# Altium PCB WGI_BOARD.PcbDoc (part 1 of 3)
Units mm, origin at the board's own origin, x right, y up, seen from the top; angles counter-clockwise.
Board outline 79.5 x 49.7 mm, 4 copper layers (Top Layer, Layer 1, Layer 2, Bottom Layer), stack 1.454 mm thick; 210 components, 179 nets, 665 pads, 228 vias.
Unrouted connection lines stored in the file: 133.
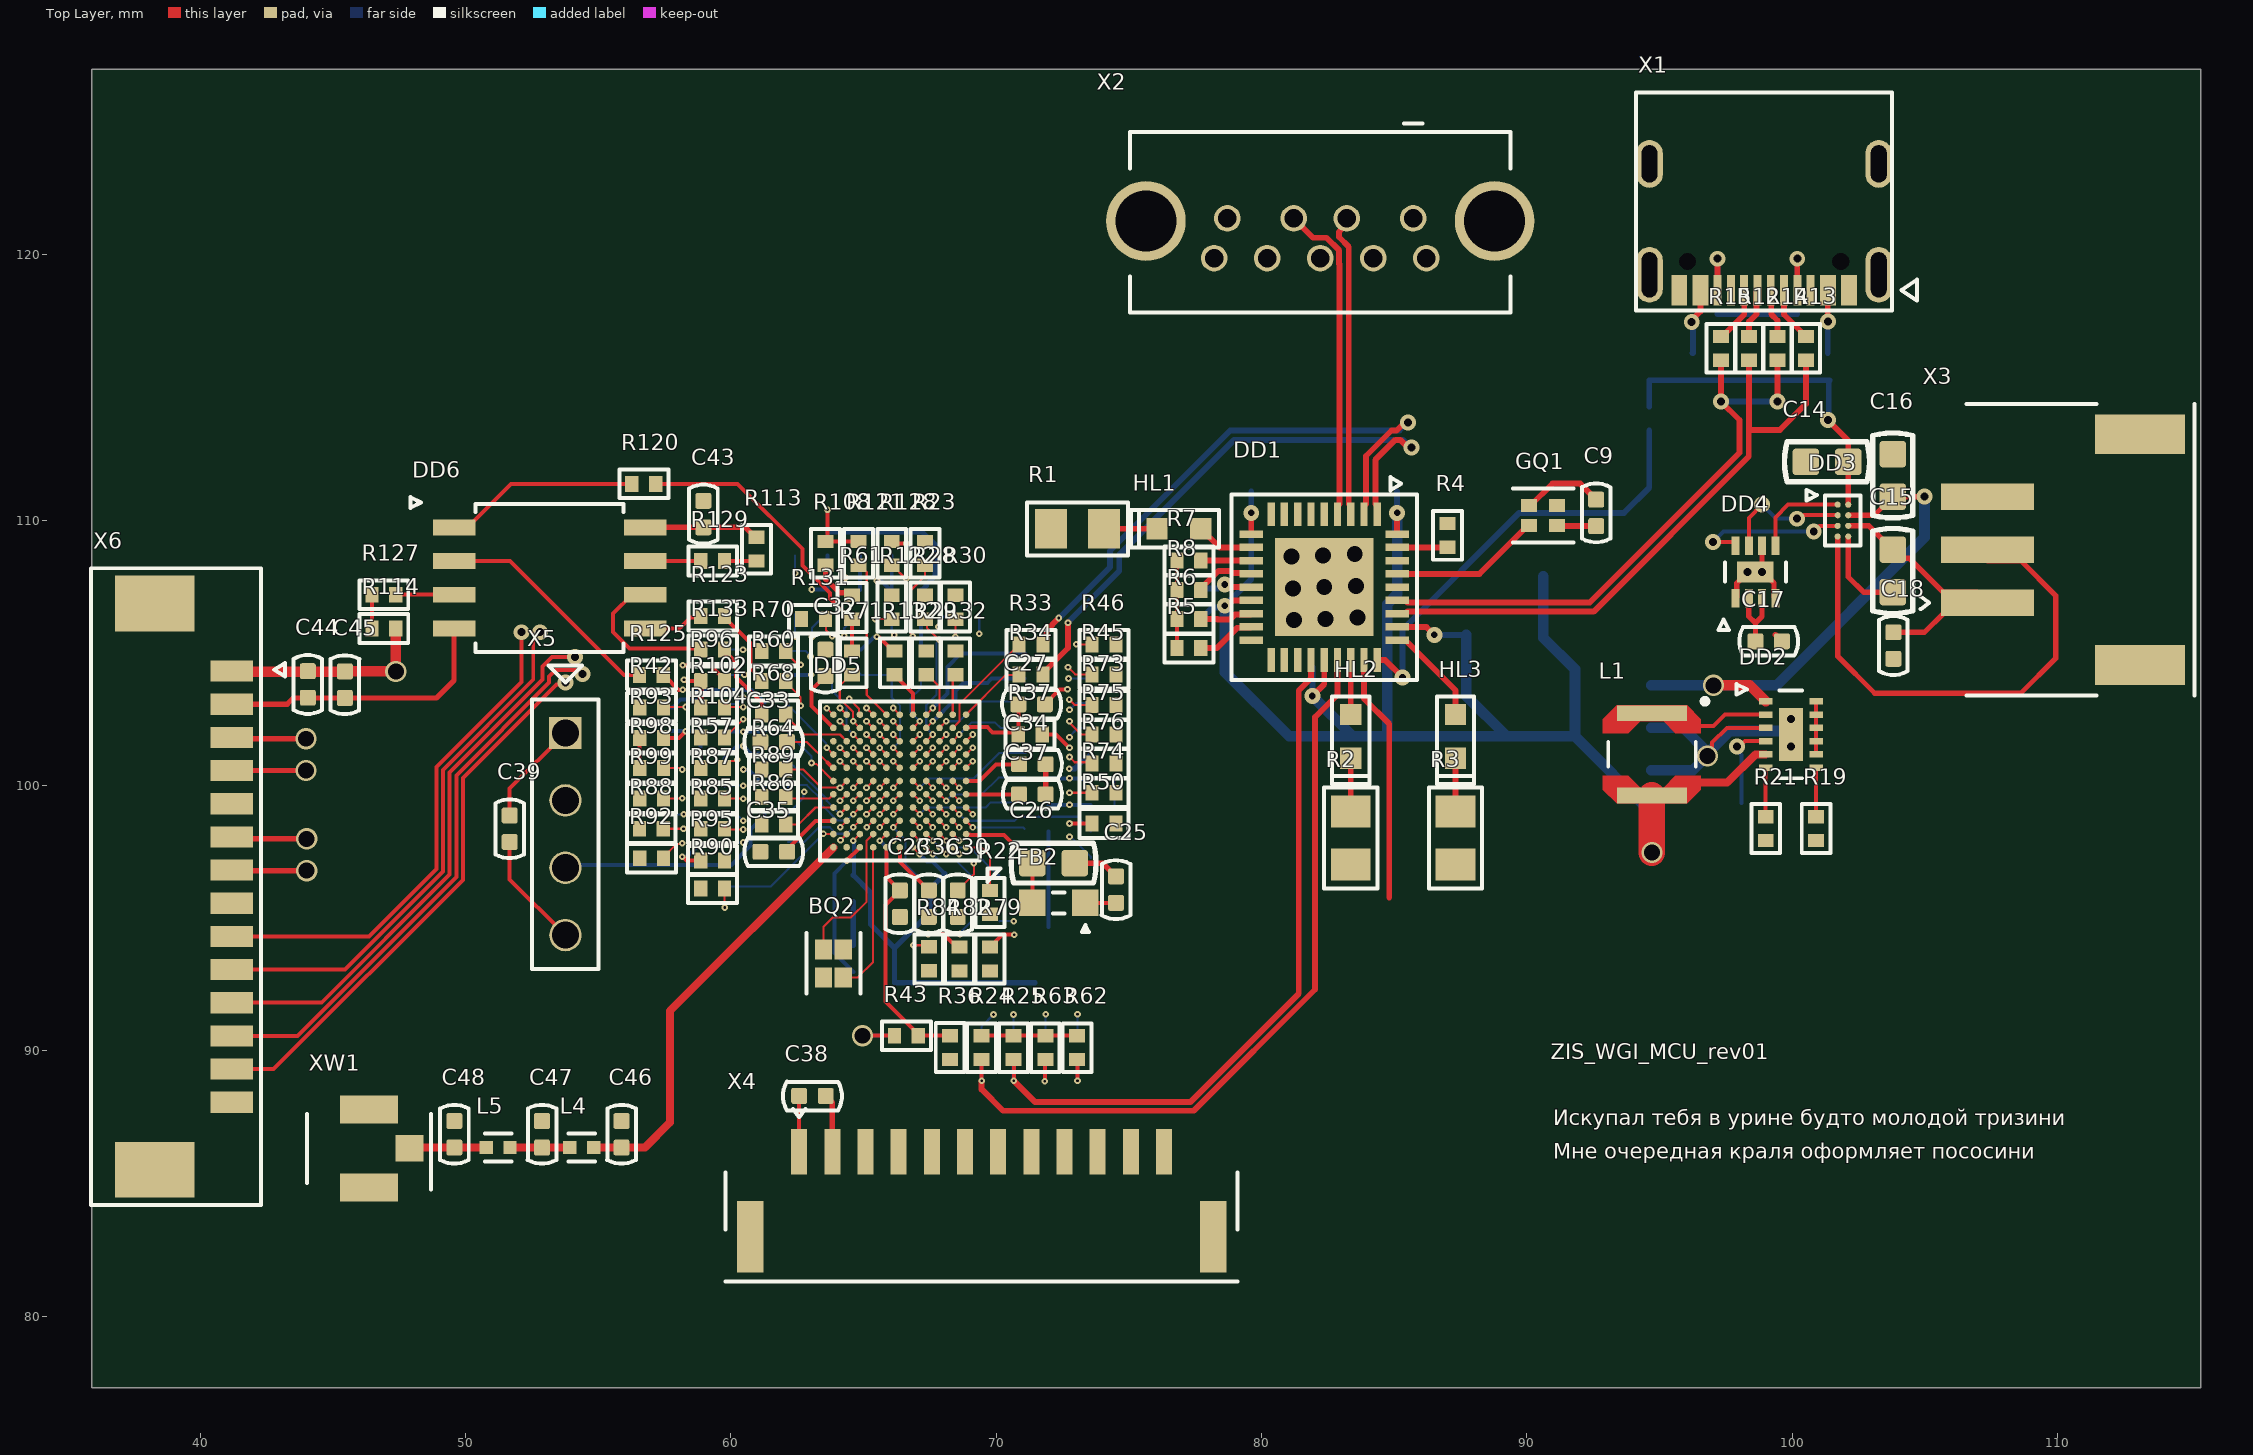
[diagram p0: Top Layer view]
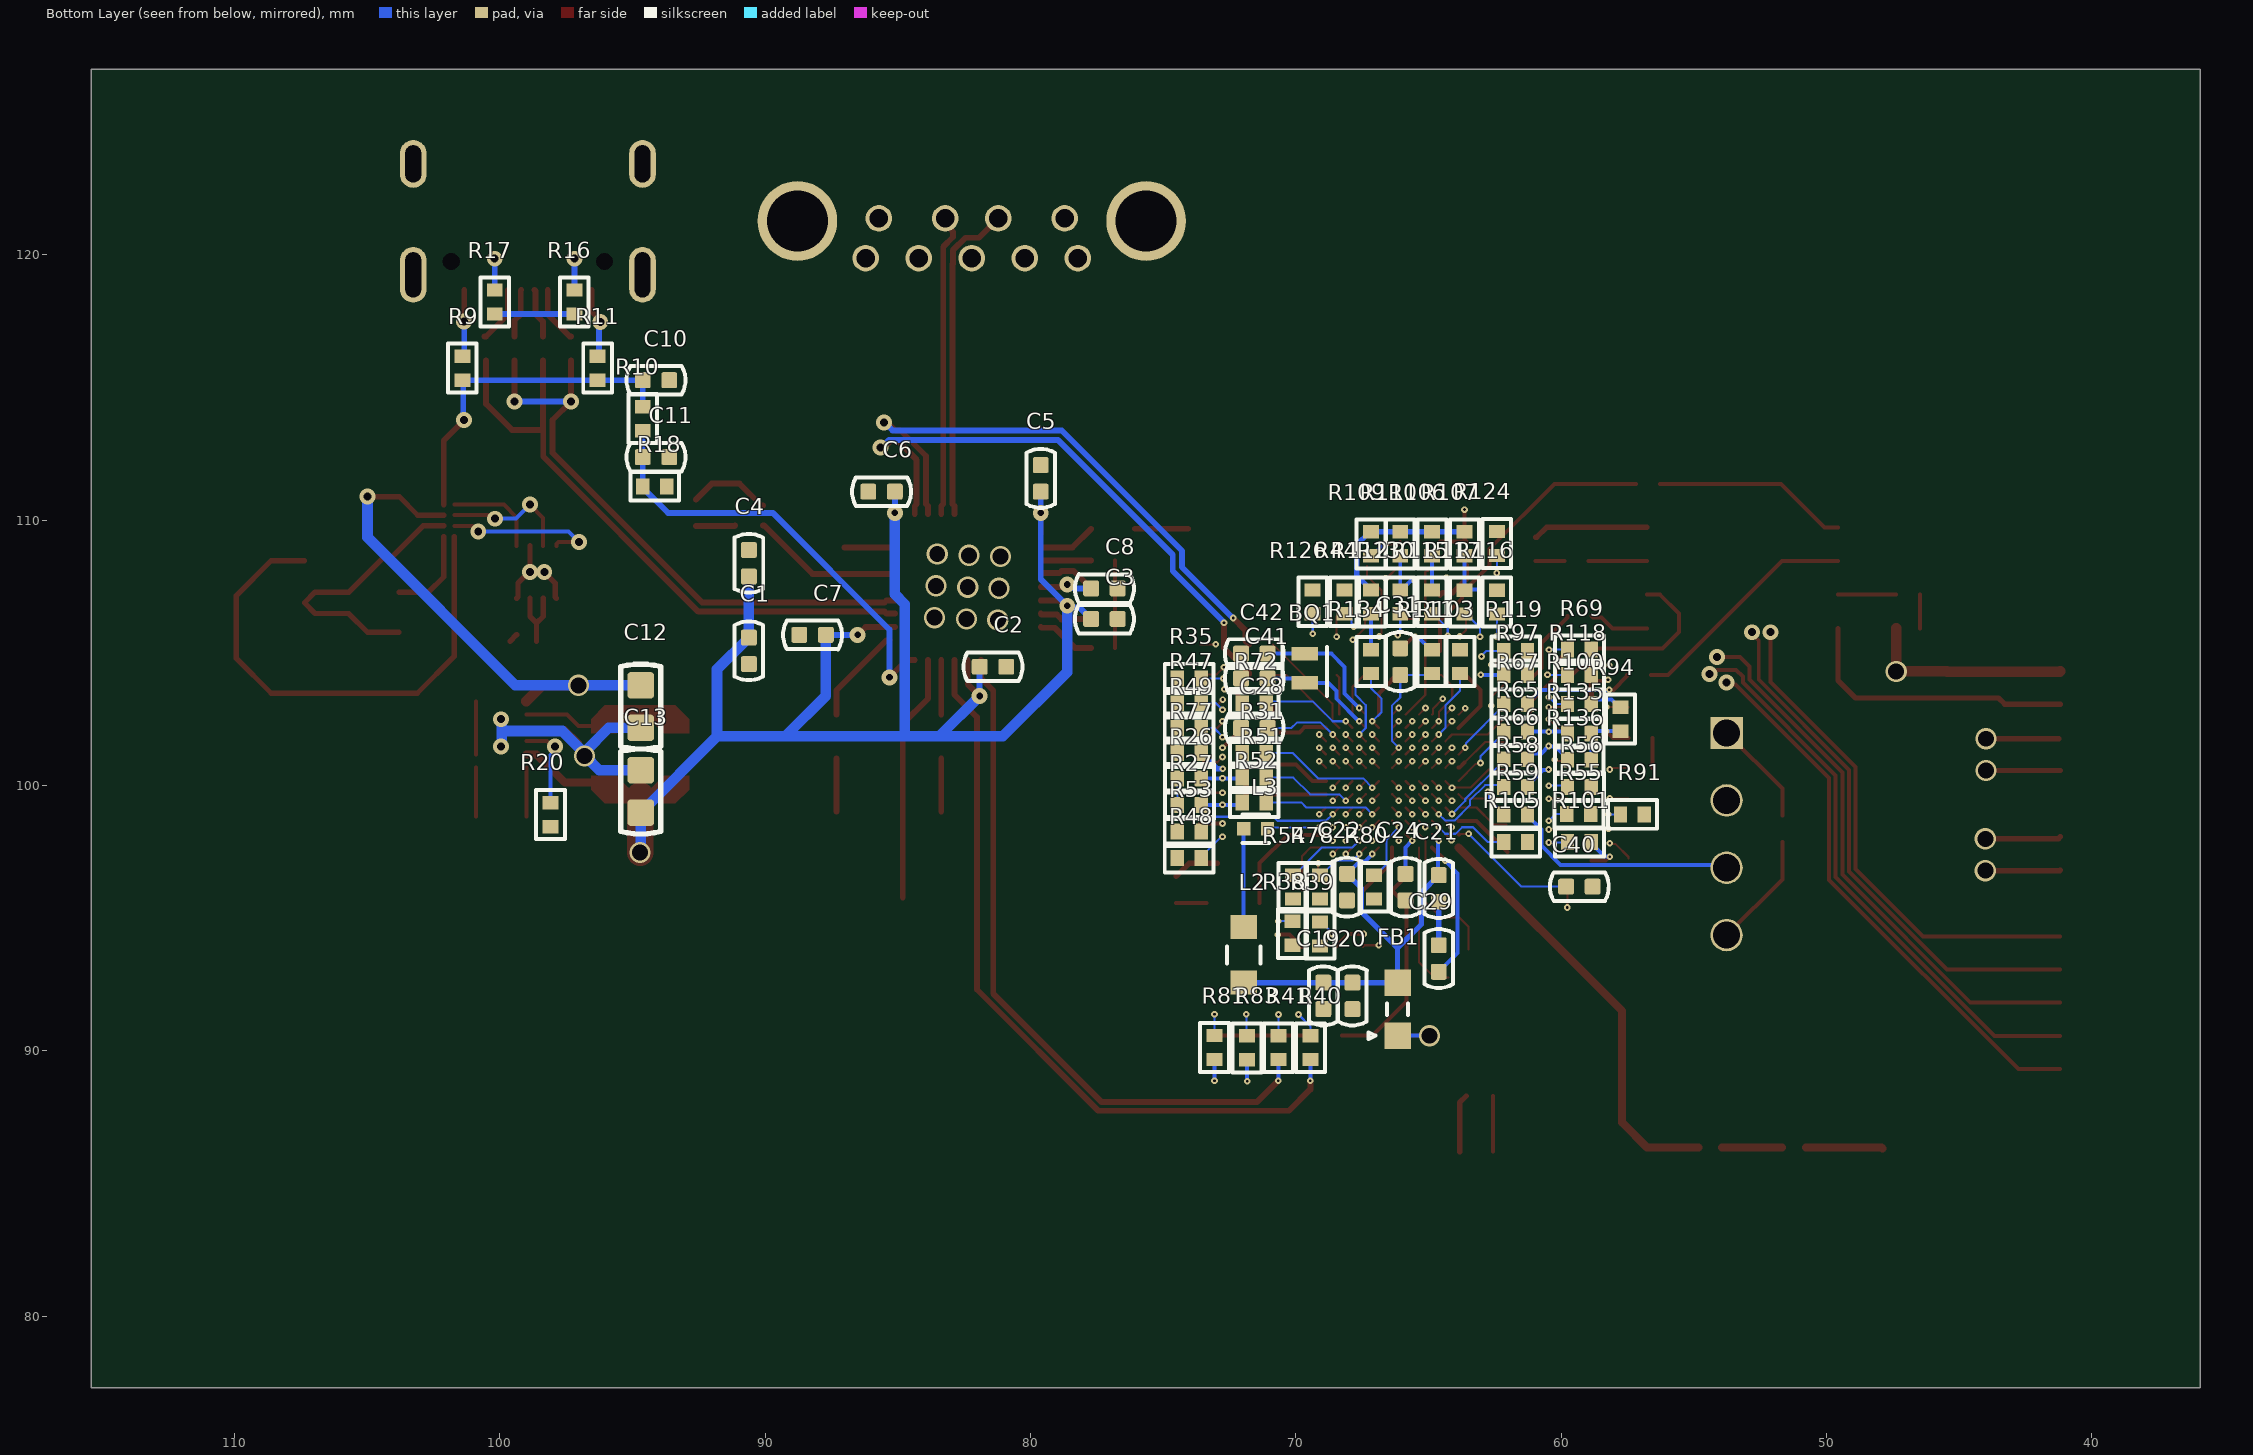
[diagram p1: Bottom Layer view, seen from below]
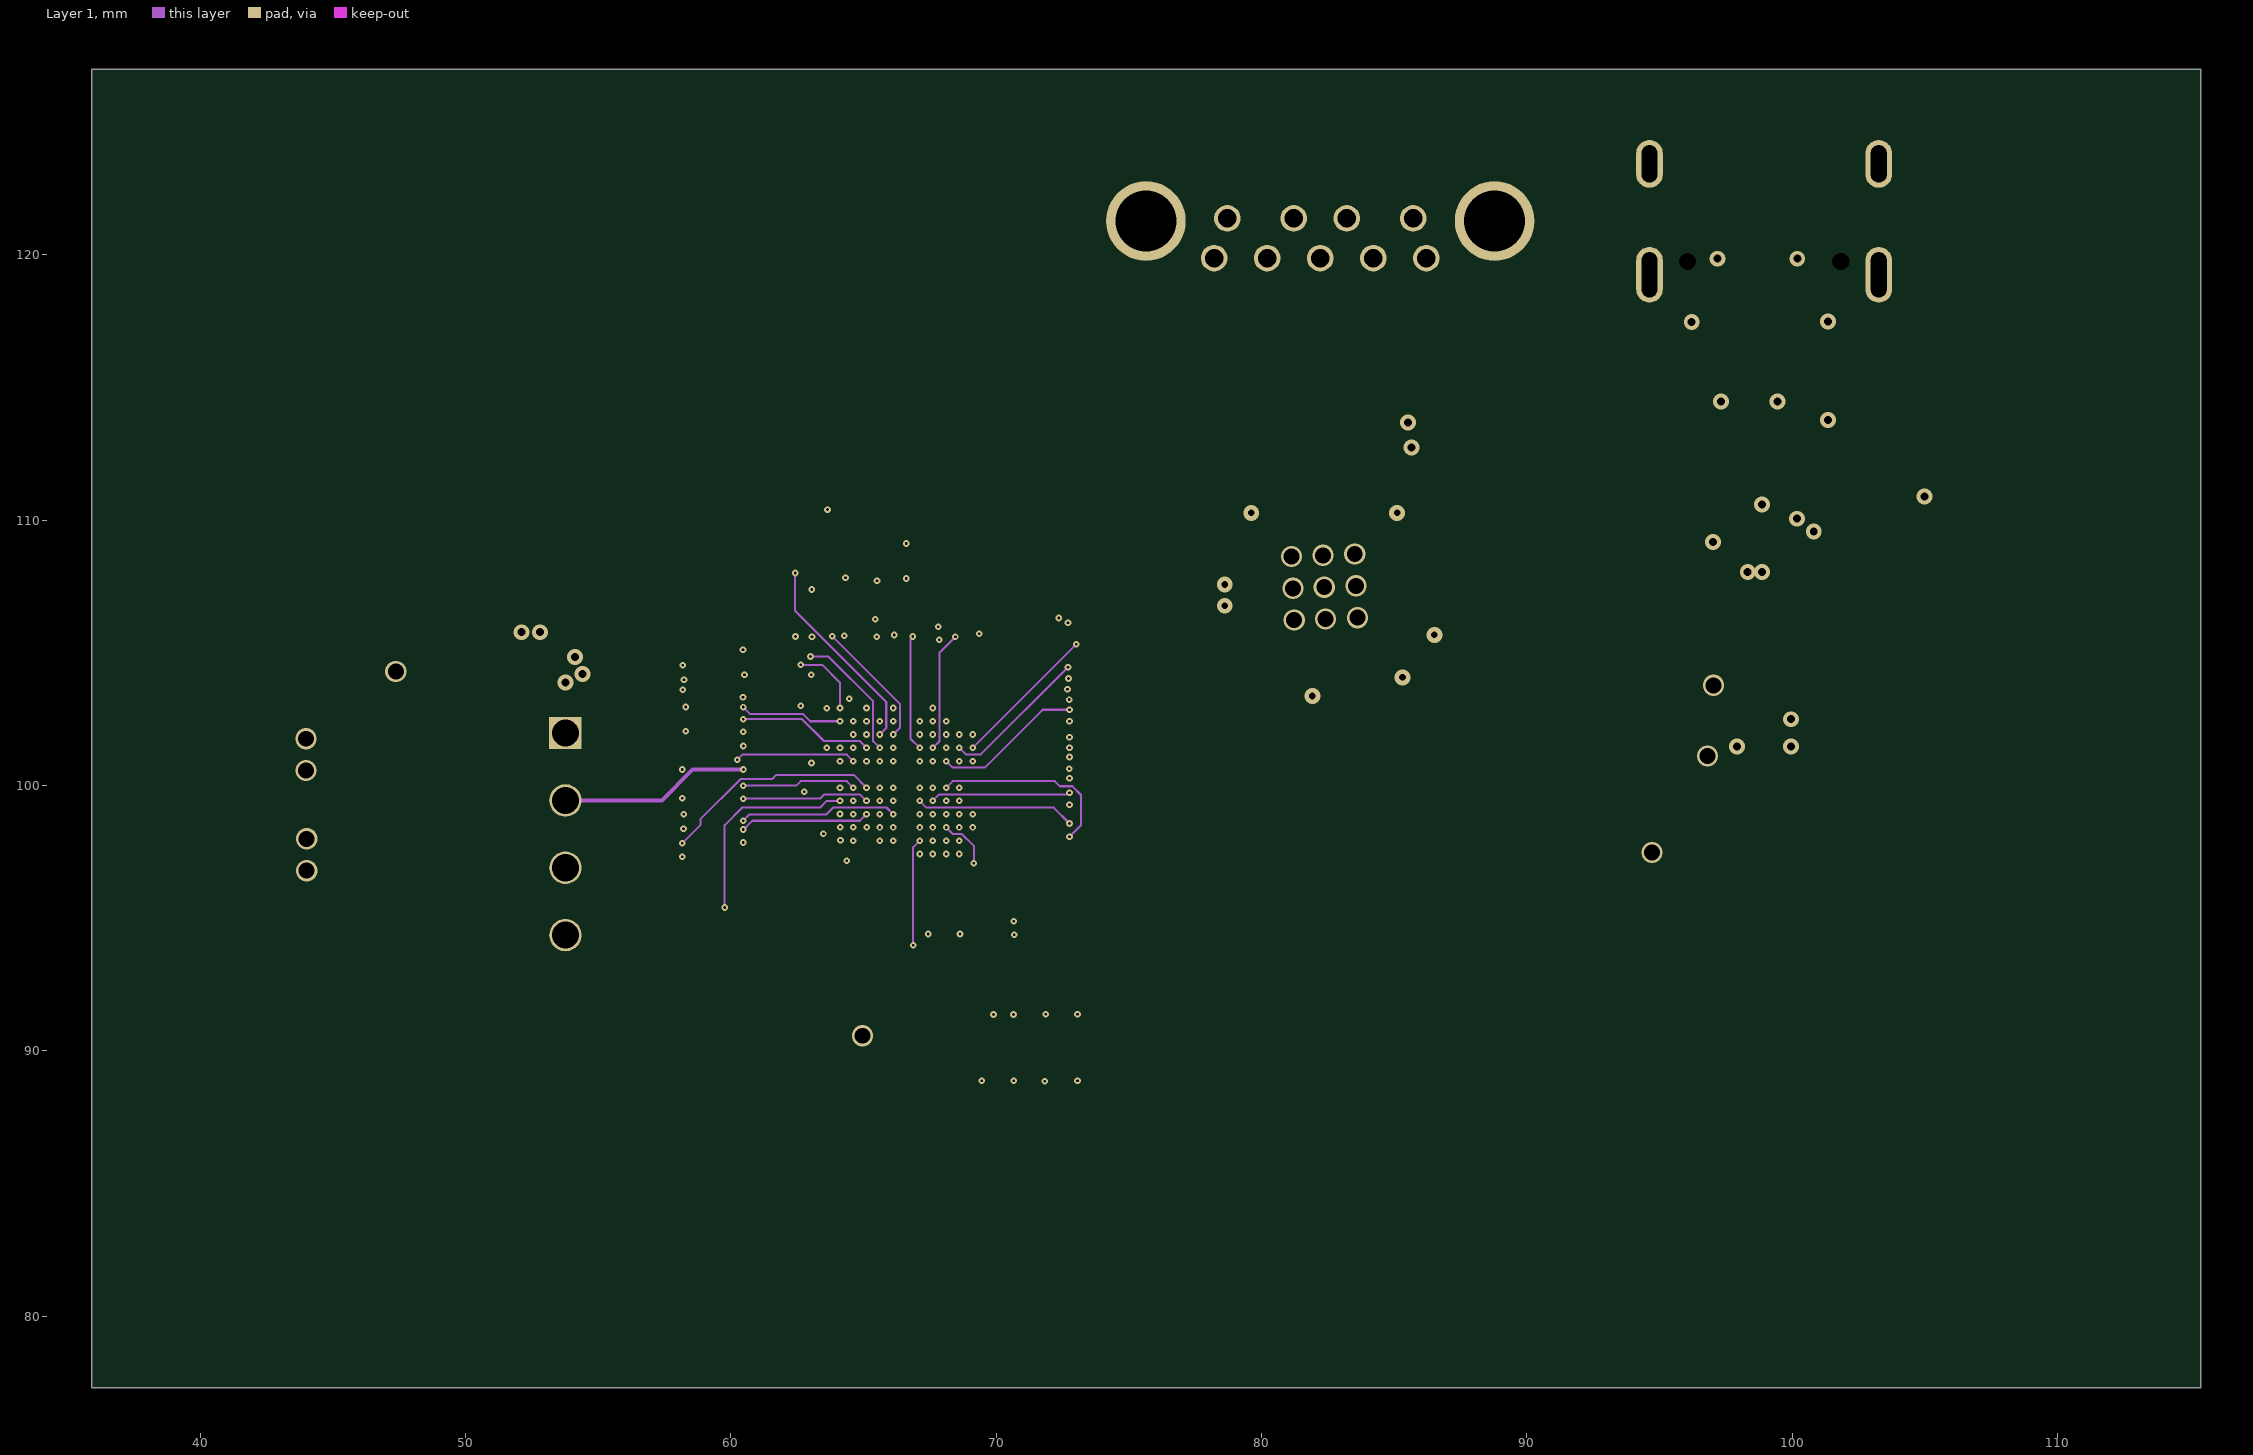
[diagram p2: Layer 1]
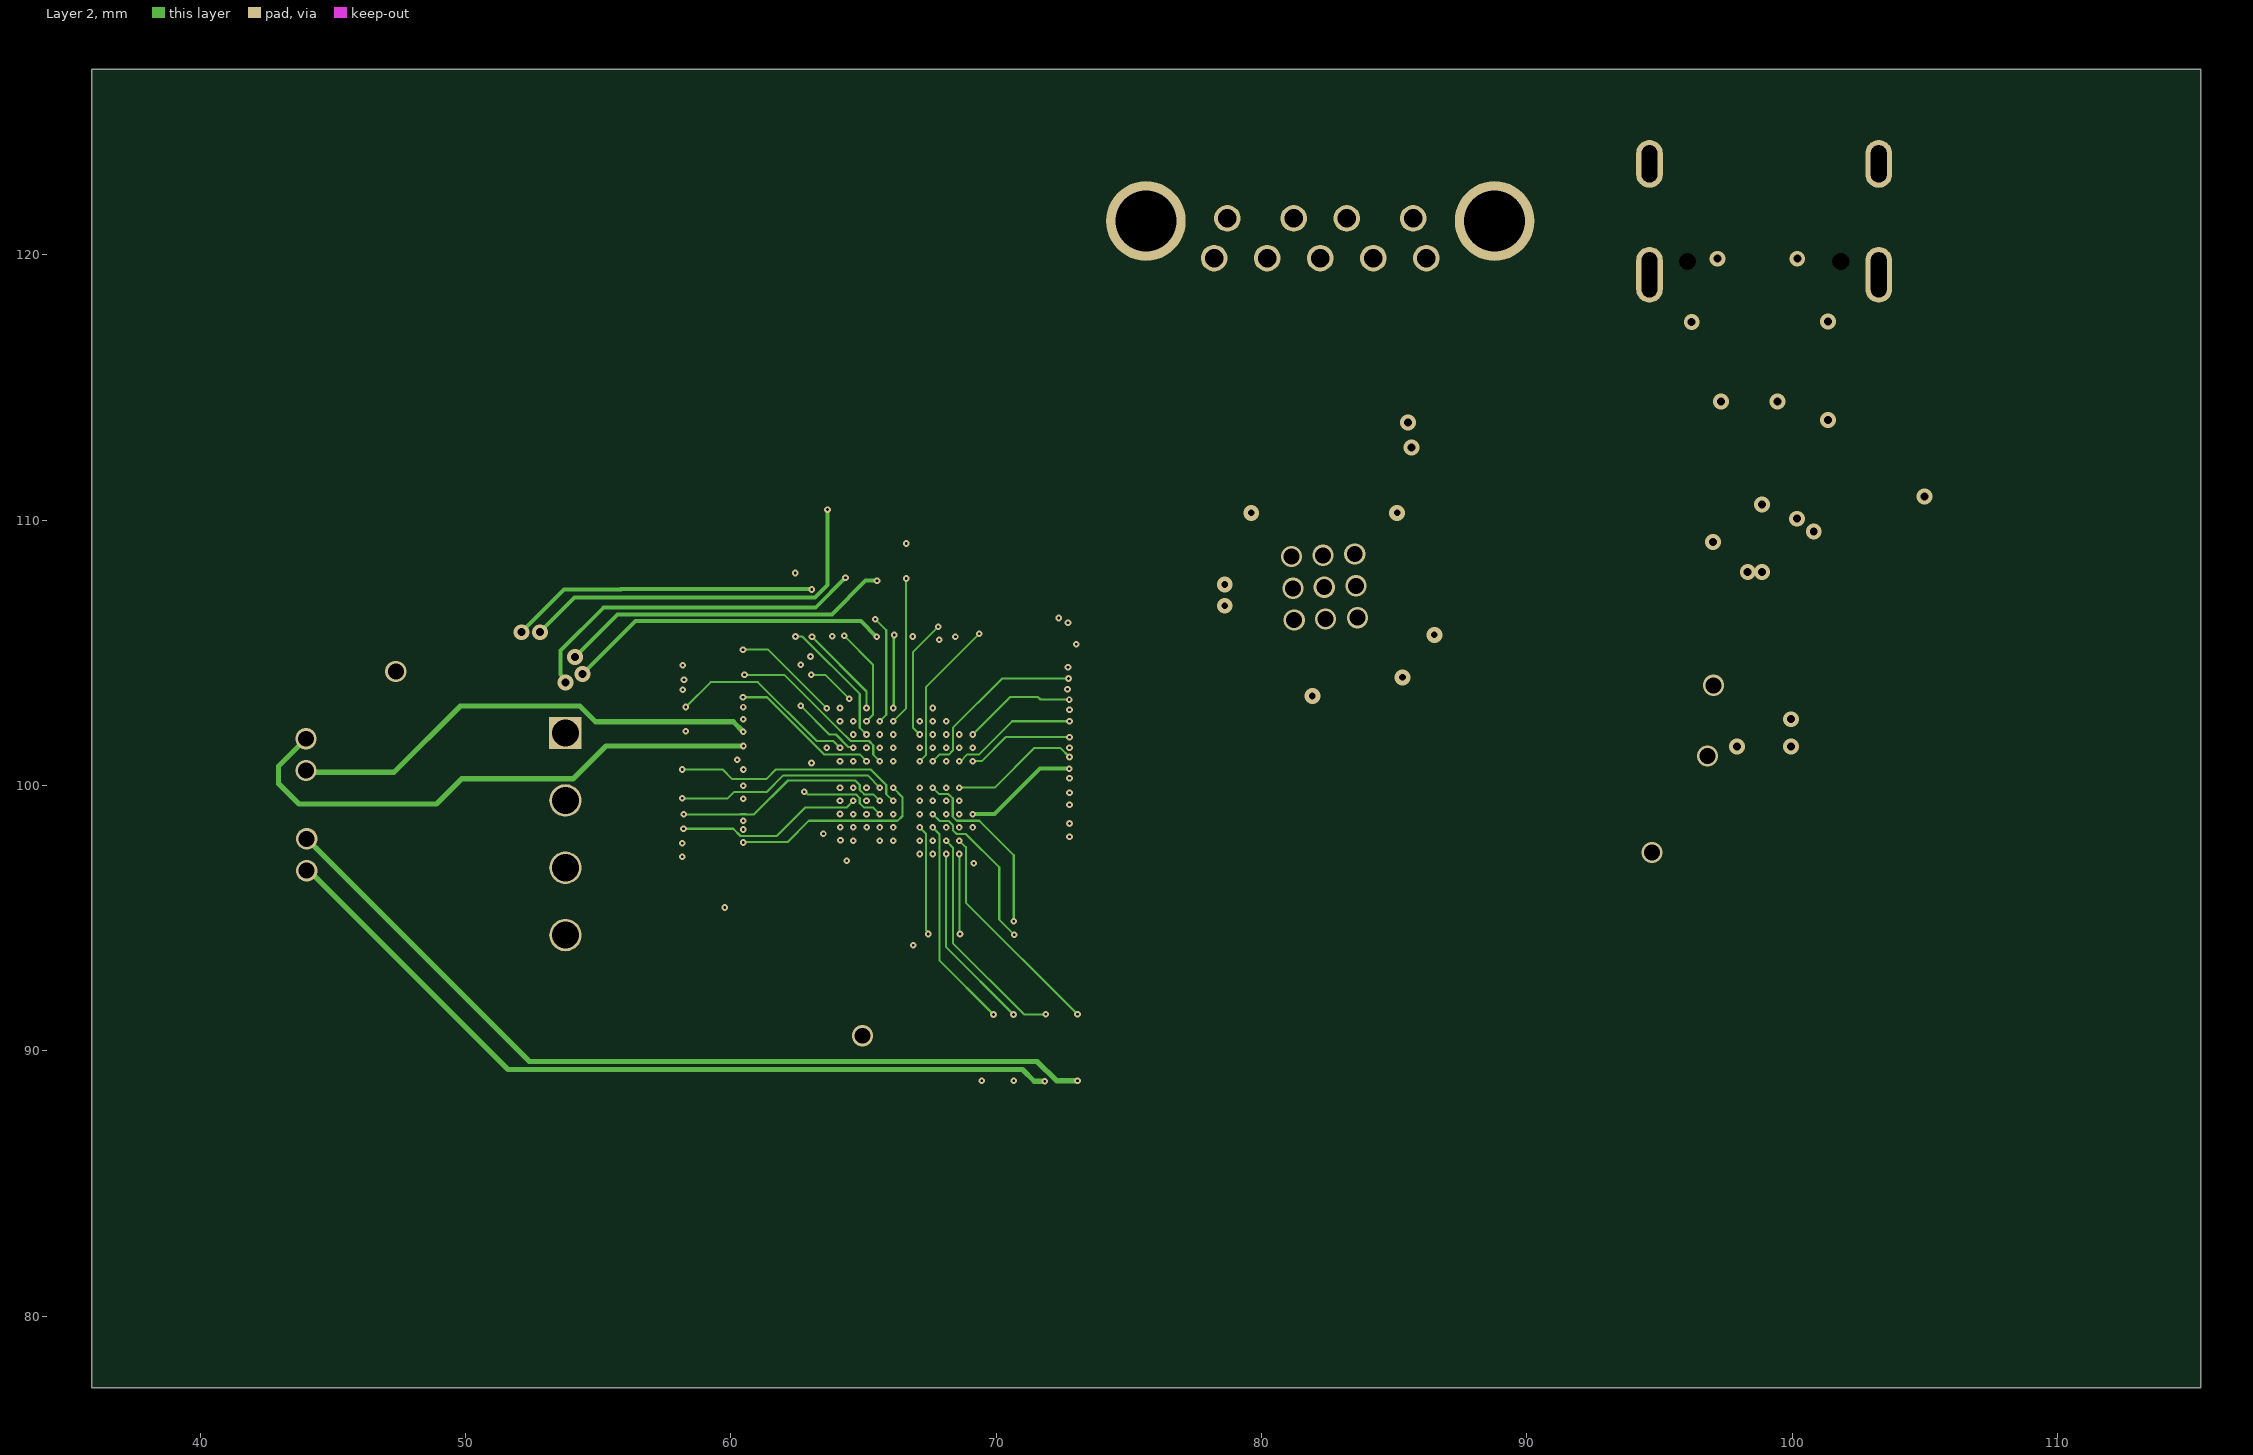
[diagram p3: Layer 2]
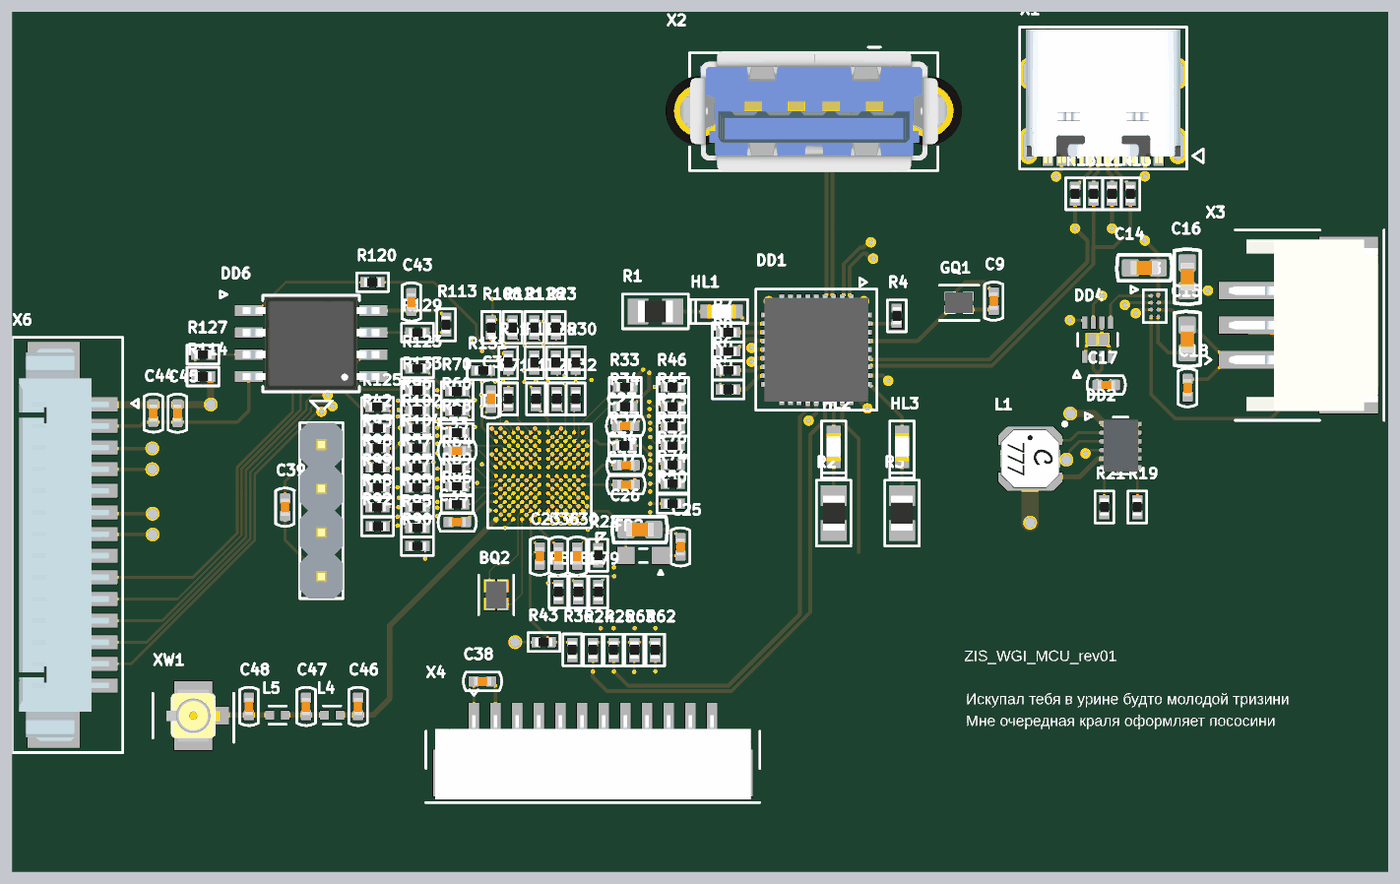
[diagram p5: 3D render of the assembled board from above, using the file's embedded part models]
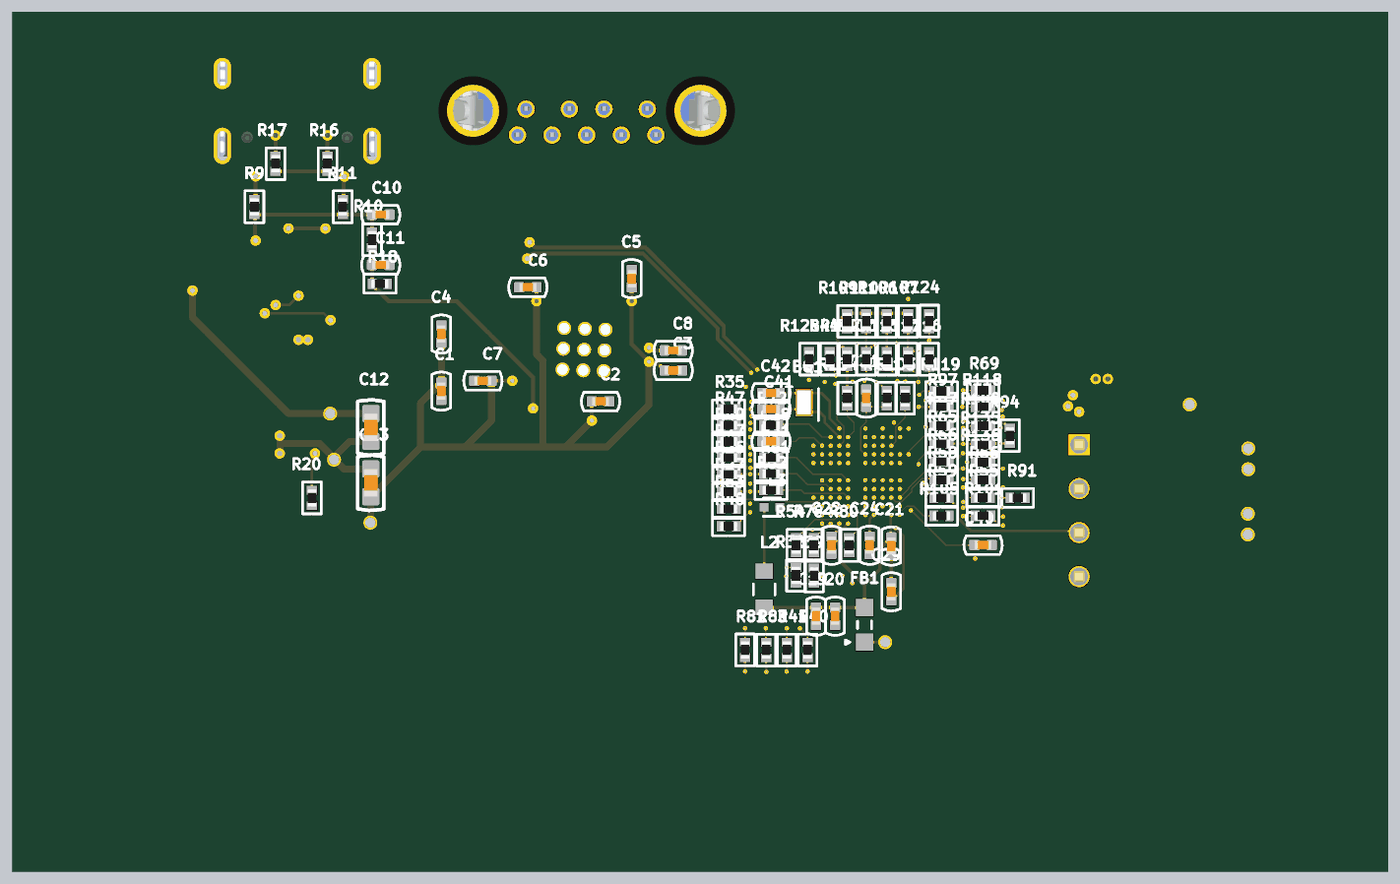
[diagram p6: 3D render of the assembled board from below, using the file's embedded part models]

## Layer stack, top to bottom
Top Solder: solder mask 0.0102, Solder Resist, Dk 3.5
Top Layer: signal copper 0.018
Dielectric 2: prepreg 0.191, FR4_HiTg170 PR, Dk 5.14
Layer 1: signal copper 0.018
Dielectric 1: core 1, FR4 HiTg170, Dk 4.6
Layer 2: signal copper 0.018
Dielectric 3: prepreg 0.191, FR4_HiTg170 PR, Dk 5.14
Bottom Layer: signal copper 0.018
Bottom Solder: solder mask 0.0102, Solder Resist, Dk 3.5

## Board outline
35.9,77.3 81,77.3 115.4,77.3 115.4,127 35.9,127

## Design rules (kind name [scope] priority, off if disabled: settings)
Clearance BGA_OUT_Clearence [InNetClass('BGA_OUT')] p1: gap=0.08 ignorepadtopadclearanceinfootprint=TRUE
Clearance [All] p2: gap=0.1 ignorepadtopadclearanceinfootprint=TRUE
DiffPairsRouting USB [InDifferentialPairClass('All Differential Pairs')] p1: maxlimit=0.127 minlimit=0.127 mostfreqgap=0.127 toplayer_minwidth=0.223 toplayer_maxwidth=0.223 toplayer_prefwidth=0.223 midlayer1_minwidth=0.122 midlayer1_maxwidth=0.122 midlayer1_prefwidth=0.122 midlayer2_minwidth=0.122 midlayer2_maxwidth=0.122 midlayer2_prefwidth=0.122 bottomlayer_minwidth=0.223 bottomlayer_maxwidth=0.223 bottomlayer_prefwidth=0.223 impedanceprofiledriven=TRUE impedanceprofileid={5C61E02C-42C3-44DD-8B43-CEFBDE8A5E1E} impedanceprofilevalue=90.000000 maxuncoupledlength=12.7
PolygonConnect [All] p1: connectstyle=Relief reliefconductorwidth=0.254 reliefentries=4 polygonreliefangle="90 Angle" airgapwidth=0.254
RoutingVias BGA_OUT_VIA [InNetClass('BGA_OUT')] p1: holewidth=0.1 width=0.25 viastyle="Through Hole" minholewidth=0.1 minwidth=0.25 maxholewidth=0.1 maxwidth=0.25
RoutingVias [All] p2: holewidth=0.6 width=0.8 viastyle="Through Hole" minholewidth=0.25 minwidth=0.6 maxholewidth=0.6 maxwidth=0.8
SolderMaskExpansion [All] p1: expansion=0 istentingtop=FALSE
SupplyNets "Schematic Supply Nets_6" [InNet('P5V_BAT')] p1: voltage=0.000
SupplyNets "Schematic Supply Nets_5" [InNet('P1V2_USB')] p2: voltage=0.000
SupplyNets "Schematic Supply Nets_4" [InNet('P3V3')] p3: voltage=0.000
SupplyNets "Schematic Supply Nets_3" [InNet('GND')] p4: voltage=0.000
SupplyNets "Schematic Supply Nets_2" [InNet('P5V_USB')] p5: voltage=0.000
SupplyNets "Schematic Supply Nets_1" [InNet('VDD_OLED')] p6: voltage=0.000
SupplyNets "Schematic Supply Nets" [InNet('P5V_SYS')] p7: voltage=0.000
Width BGA_OUT [InNetClass('BGA_OUT')] p1: maxlimit=1 minlimit=0.08 preferedwidth=0.08 minimp=50.000000 maximp=50.000000 favimp=50.000000
Width RF [InNetClass('RF')] p2: maxlimit=0.305 minlimit=0.197 preferedwidth=0.305 toplayer_minwidth=0.305 midlayer1_maxwidth=0.197 midlayer1_prefwidth=0.215 midlayer2_maxwidth=0.197 midlayer2_prefwidth=0.215 bottomlayer_minwidth=0.305 impedanceprofiledriven=TRUE impedanceprofileid={570033EE-A810-4497-92D8-E5AA39A7C316} impedanceprofilevalue=50.000000 minimp=50.000000 maximp=50.000000 favimp=50.000000
Width [All] p3: maxlimit=1 minlimit=0.15 preferedwidth=0.2 minimp=50.000000 maximp=50.000000 favimp=50.000000
29 further rules are at their usual default settings.

## Classes and differential pairs
net class RF: NetC46_1 NetC47_1 NetC48_1
net class BGA_OUT: GND NetBQ2_1 NetBQ2_3 NetC19_1 NetC23_1 NetC24_1 NetC40_1 NetDD5_A1 NetDD5_A2 NetDD5_A3 NetDD5_A4 NetDD5_B2 NetDD5_B3 NetDD5_B4 NetDD5_B5 NetDD5_C1 NetDD5_C4 NetDD5_C5 NetDD5_C6 NetDD5_C9 NetDD5_D1 NetDD5_D2 NetDD5_D4 NetDD5_D5 NetDD5_D6 NetDD5_D7 NetDD5_D8 NetDD5_D9 NetDD5_D10 NetDD5_D11 NetDD5_E3 NetDD5_E4 NetDD5_E5 NetDD5_E6 NetDD5_E7 NetDD5_E8 NetDD5_E9 NetDD5_E10 NetDD5_E11 NetDD5_F2 NetDD5_F3 NetDD5_F4 NetDD5_F5 NetDD5_F6 NetDD5_F7 NetDD5_F8 NetDD5_F9 NetDD5_F10 NetDD5_F11 NetDD5_G1 NetDD5_G2 NetDD5_G3 NetDD5_G4 NetDD5_G5 NetDD5_G7 NetDD5_G8 NetDD5_G9 NetDD5_H1 NetDD5_H2 NetDD5_H4 NetDD5_H5 NetDD5_H7 NetDD5_H8 NetDD5_H9 NetDD5_H10 NetDD5_H11 NetDD5_J1 NetDD5_J4 NetDD5_J5 NetDD5_J6 NetDD5_J7 NetDD5_J8 NetDD5_J9 NetDD5_J10 NetDD5_K2 NetDD5_K3 NetDD5_K5 NetDD5_K6 NetDD5_K7 NetDD5_K8 NetDD5_K9 NetDD5_K10 NetDD5_L1 NetDD5_L2 NetDD5_L3 NetDD5_L5 NetDD5_L6 NetDD5_L7 NetDD5_L8 NetDD5_L9 NetDD5_L10 NetDD5_L11 P3V3
component class USB_INPUT: C1 C2 C3 C4 C5 C6 C7 C8 C9 C10 C11 DD1 GQ1 HL1 HL2 HL3 R1 R2 R3 R4 R5 R6 R7 R8 R9 R10 R11 R12 R13 R14 R15 R16 R17 R18 X1 X2
component class Sensors_Output: C44 C45 X6
component class RF: C47 C48 L4 L5 XW1
component class PWR_Battery_Protection: C12 C13 C14 C15 C16 C17 C18 DD3 DD4 L1 R19 R20 R21 X3
component class MCU: BQ1 BQ2 C19 C20 C21 C22 C23 C24 C25 C26 C27 C28 C29 C30 C31 C32 C33 C34 C35 C36 C37 C38 C39 C40 C41 C42 C43 DD5 DD6 FB1 FB2 L2 L3 R22 R23 R24 R25 R26 R27 R28 R29 R30 R31 R32 R33 R34 R35 R36 R37 R38 R39 R40 R41 R42 R43 R44 R45 R46 R47 R48 R49 R50 R51 R52 R53 R54 R55 R56 R57 R58 R59 R60 R61 R62 R63 R64 R65 R66 R67 R68 R69 R70 R71 R72 R73 R74 R75 R76 R77 R78 R79 R80 R81 R82 R83 R84 R85 R86 R87 R88 R89 R90 R91 R92 R93 R94 R95 R96 R97 R98 R99 R100 R101 R102 R103 R104 R105 R106 R107 R108 R109 R110 R111 R112 R113 R114 R115 R116 R117 R118 R119 R120 R121 R122 R123 R124 R125 R126 R127 R128 R129 R130 R131 R132 R133 R134 R135 R136 X4 X5
differential pair USB_SWAP: +USB_SWAP_DP -USB_SWAP_DN
differential pair USB_FLEX: +USB_FLEX_DP -USB_FLEX_DN
differential pair USB_DN: +USB_DN_DP -USB_DN_DN

## Components (designator, comment, footprint, x,y, rotation, side; value= is the part's Value field where it differs from the comment)
BQ1 "32.768 kHz" BQ_SMD1610-2P 69.66,104.42 r90 bottom
BQ2 "32 MHz" BQ_SMD1612-4P 63.86,93.295 r90 top
C1 "4.7 u" C0402 90.61,105.075 r270 bottom
C2 "100 n" C0402 81.41,104.475 r180 bottom
C3 "100 n" C0402 77.21,106.275 r180 bottom
C4 "4.7 u" C0402 90.61,108.375 r90 bottom
C5 "100 n" C0402 79.61,111.575 r90 bottom
C6 "100 n" C0402 85.61,111.075 r0 bottom
C7 "100 n" C0402 88.21,105.675 r0 bottom
C8 "1 u" C0402 77.21,107.425 r180 bottom
C9 "100 n" C0402 92.61,110.275 r90 top
C10 "2.2 u" C0402 94.11,115.275 r180 bottom
C11 "1 u" C0402 94.11,112.375 r180 bottom
C12 "10 u" C0603 94.685,102.975 r270 bottom
C13 "10 u" C0603 94.685,99.775 r90 bottom
C14 "1 u" C0603 101.31,112.2 r180 top
C15 "1 u" C0603 103.788,108.086 r270 top
C16 "10 u" C0603 103.788,111.686 r90 top
C17 "100 n" C0402 99.111,105.435 r0 top
C18 "100 n" C0402 103.81,105.275 r270 top
C19 "4.7 u" C0402 68.96,92.07 r270 bottom
C20 "2.2 u" C0402 67.86,92.07 r270 bottom
C21 "100 n" C0402 64.61,96.12 r270 bottom
C22 "100 n" C0402 68.067,96.17 r270 bottom
C23 "100 n" C0402 66.367,95.546 r270 top
C24 "470 n" C0402 65.86,96.17 r270 bottom
C25 "1 u" C0402 74.51,96.075 r90 top
C26 "10 u" C0603 72.16,97.075 r0 top
C27 "100 n" C0402 71.33,103.06 r0 top
C28 "100 n" C0402 71.56,102.166 r0 bottom
C29 "100 n" C0402 64.61,93.479 r90 bottom
C30 "100 n" C0402 68.547,95.546 r270 top
C31 "100 n" C0402 66.06,104.67 r90 bottom
C32 "100 n" C0402 63.56,104.62 r90 top
C33 "100 n" C0402 61.61,101.637 r180 top
C34 "1 u" C0402 71.36,100.8 r0 top
C35 "100 n" C0402 61.61,97.503 r180 top
C36 "100 n" C0402 67.457,95.546 r270 top
C37 "1 u" C0402 71.36,99.67 r0 top
C38 "100 n" C0402 63.071,88.3 r0 top
C39 "100 n" C0402 51.66,98.37 r270 top
C40 "100 n" C0402 59.31,96.187 r180 bottom
C41 "6 p" C0402 71.56,104.035 r0 bottom
C42 "6 p" C0402 71.56,104.97 r0 bottom
C43 "100 n" C0402 58.96,110.23 r90 top
C44 "4.7 u" C0402 44.053,103.808 r270 top
C45 "100 n" C0402 45.45,103.8 r270 top
C46 "1.5 pF" C0402 55.875,86.856 r90 top
C47 "3.9 pF" C0402 52.878,86.856 r90 top
C48 "2.7 pF" C0402 49.575,86.856 r90 top
DD1 "USB2532" SQFN-36_6X6_P0.5_EP3.7X3.7 82.36,107.475 r270 top
DD2 "TPS62740DSSR" WSON-12_3x2_P0.5_EP0.9x2 99.949,101.923 r0 top
DD3 "BQ25180YBGR" DSBGA_TI_BQ25180YBGR 101.91,109.986 r0 top
DD4 "MAX17048G+T10" TDFN-8_2x2_P0.5_EP0.8x1.38 98.611,108.045 r90 top
DD5 "STM32WBA65PII6" UFBGA-121_6x6_P0.5 66.36,100.17 r180 top
DD6 "W25Q64JVSSIQ" SOIC-8_5.28x5.28_P1.27 53.165,107.825 r0 top
FB1 "" FB0603 66.16,91.57 r90 bottom
FB2 "" FB0603 72.36,95.575 r180 top
GQ1 "24 MHz" GQ_SMD1612-4P 90.61,110.175 r180 top
HL1 "APT1608CGCK" LED1608 76.885,109.675 r0 top
HL2 "APT1608CGCK" LED1608 83.36,101.85 r90 top
HL3 "APT1608SURCK" LED1608 87.31,101.85 r90 top
L1 "2.2 uH" IND3.3x3.3 94.71,101.173 r270 top
L2 "2.2 uH" IND0805 71.96,93.62 r90 bottom
L3 "10 nH" IND0402 71.51,98.37 r180 bottom
L4 "1.8 nH" IND0402 54.376,86.356 r180 top
L5 "1.3 nH" IND0402 51.225,86.356 r180 top
R1 "200" R0805 73.06,109.675 r0 top
R2 "200" R0805 83.36,98.025 r90 top
R3 "200" R0805 87.31,98.025 r90 top
R4 "12 k" R0402 87.01,109.425 r270 top
R5 "10 k" R0402 77.26,105.175 r180 top
R6 "10 k" R0402 77.26,106.275 r180 top
R7 "10 k" R0402 77.26,108.475 r180 top
R8 "10 k" R0402 77.26,107.375 r180 top
R9 "0" R0402 101.41,115.725 r270 bottom
R10 "82 k" R0402 94.61,113.825 r270 bottom
R11 "0" R0402 96.31,115.725 r270 bottom
R12 "0" R0402 98.377,116.475 r270 top
R13 "0" R0402 100.51,116.475 r270 top
R14 "0" R0402 99.443,116.475 r270 top
R15 "0" R0402 97.31,116.475 r270 top
R16 "5.1 k" R0402 97.189,118.222 r90 bottom
R17 "5.1 k" R0402 100.189,118.222 r90 bottom
R18 "100 k" R0402 94.16,111.275 r0 bottom
R19 "4.7 k" R0402 100.899,98.375 r270 top
R20 "0" R0402 98.085,98.9 r270 bottom
R21 "0" R0402 98.999,98.375 r270 top
R22 "0" R0402 69.76,95.596 r90 top
R23 "0" R0402 67.31,108.75 r270 top
R24 "4.7 k" R0402 69.447,90.12 r90 top
R25 "4.7 k" R0402 70.647,90.12 r90 top
R26 "4.7 k" R0402 74.01,100.27 r0 bottom
R27 "4.7 k" R0402 74.01,99.27 r0 bottom
R28 "0" R0402 67.31,106.72 r270 top
R29 "0" R0402 67.36,104.62 r270 top
R30 "0" R0402 68.46,106.72 r270 top
R31 "0" R0402 71.56,101.232 r180 bottom
R32 "0" R0402 68.46,104.62 r270 top
R33 "0" R0402 71.31,105.32 r180 top
R34 "0" R0402 71.31,104.19 r180 top
R35 "0" R0402 74.01,104.035 r180 bottom
R36 "0" R0402 68.26,90.12 r270 top
R37 "0" R0402 71.28,101.93 r0 top
R38 "0" R0402 70.118,94.429 r90 bottom
R39 "0" R0402 69.081,94.403 r90 bottom
R40 "0" R0402 69.447,90.12 r90 bottom
R41 "0" R0402 70.647,90.12 r90 bottom
R42 "0" R0402 57.01,102.946 r0 top
R43 "0" R0402 66.61,90.57 r180 top
R44 "0" R0402 68.16,106.92 r270 bottom
R45 "0" R0402 74.06,104.19 r180 top
R46 "0" R0402 74.06,105.32 r180 top
R47 "0" R0402 74.01,103.101 r180 bottom
R48 "0" R0402 74.01,97.266 r180 bottom
R49 "0" R0402 74.01,102.166 r180 bottom
R50 "0" R0402 74.06,98.57 r180 top
R51 "0" R0402 71.56,100.297 r180 bottom
R52 "0" R0402 71.56,99.363 r180 bottom
R53 "0" R0402 74.01,98.27 r180 bottom
R54 "0" R0402 70.11,96.17 r90 bottom
R55 "0" R0402 59.33,98.92 r0 bottom
R56 "0" R0402 59.31,99.95 r0 bottom
R57 "0" R0402 59.31,100.658 r0 top
R58 "0" R0402 61.71,99.95 r0 bottom
R59 "0" R0402 61.71,98.91 r0 bottom
R60 "0" R0402 61.61,103.945 r0 top
R61 "4.7 k" R0402 64.56,106.72 r90 top
R62 "1.1 k" R0402 73.047,90.12 r90 top
R63 "1.1 k" R0402 71.847,90.12 r90 top
R64 "0" R0402 61.61,100.603 r0 top
R65 "0" R0402 61.71,102.03 r0 bottom
R66 "0" R0402 61.71,100.99 r0 bottom
R67 "0" R0402 61.71,103.07 r0 bottom
R68 "0" R0402 61.61,102.67 r0 top
R69 "0" R0402 59.31,105.12 r0 bottom
R70 "0" R0402 61.61,105.07 r0 top
R71 "0" R0402 64.56,104.62 r270 top
R72 "0" R0402 71.56,103.101 r180 bottom
R73 "0" R0402 74.06,103.028 r180 top
R74 "0" R0402 74.06,99.728 r180 top
R75 "0" R0402 74.06,101.928 r180 top
R76 "0" R0402 74.06,100.828 r180 top
R77 "0" R0402 74.01,101.232 r180 bottom
R78 "0" R0402 69.089,96.17 r90 bottom
R79 "0" R0402 69.76,93.463 r90 top
R80 "0" R0402 67.046,96.17 r90 bottom
R81 "0" R0402 73.06,90.125 r90 bottom
R82 "0" R0402 68.609,93.463 r90 top
R83 "0" R0402 71.834,90.115 r90 bottom
R84 "0" R0402 67.457,93.47 r90 top
R85 "0" R0402 59.31,98.37 r0 top
R86 "0" R0402 61.61,98.537 r0 top
R87 "0" R0402 59.31,99.514 r0 top
R88 "0" R0402 57,98.37 r0 top
R89 "0" R0402 61.61,99.57 r0 top
R90 "0" R0402 59.31,96.12 r0 top
R91 "0" R0402 57.31,98.912 r0 bottom
R92 "0" R0402 57.01,97.257 r0 top
R93 "4.7 k" R0402 57.01,101.784 r0 top
R94 "4.7 k" R0402 57.76,102.497 r270 bottom
R95 "4.7 k" R0402 59.31,97.17 r0 top
R96 "4.7 k" R0402 59.31,103.945 r0 top
R97 "0" R0402 61.71,104.17 r0 bottom
R98 "0" R0402 57.01,100.658 r0 top
R99 "0" R0402 57.01,99.514 r0 top
R100 "0" R0402 59.31,103.07 r0 bottom
R101 "0" R0402 59.31,97.87 r0 bottom
R102 "0" R0402 59.31,102.946 r0 top
R103 "0" R0402 63.81,104.67 r270 bottom
R104 "0" R0402 59.31,101.802 r0 top
R105 "10 k" R0402 61.71,97.87 r0 bottom
R106 "4.7 k" R0402 64.86,109.112 r90 bottom
R107 "4.7 k" R0402 63.64,109.112 r90 bottom
R108 "4.7 k" R0402 63.56,108.75 r270 top
R109 "4.7 k" R0402 67.16,109.112 r90 bottom
R110 "4.7 k" R0402 66.06,109.112 r90 bottom
R111 "4.7 k" R0402 64.86,104.67 r270 bottom
R112 "4.7 k" R0402 67.16,106.92 r90 bottom
R113 "4.7 k" R0402 60.965,108.91 r90 top
R114 "4.7 k" R0402 46.92,105.92 r0 top
R115 "0" R0402 64.86,106.92 r270 bottom
R116 "0" R0402 62.42,106.912 r270 bottom
R117 "0" R0402 63.64,106.912 r270 bottom
R118 "0" R0402 59.31,104.17 r0 bottom
R119 "0" R0402 61.71,105.07 r0 bottom
R120 "0" R0402 56.715,111.37 r180 top
R121 "0" R0402 64.81,108.75 r270 top
R122 "0" R0402 66.06,106.72 r270 top
R123 "0" R0402 59.31,106.39 r180 top
R124 "0" R0402 62.42,109.12 r270 bottom
R125 "0" R0402 57,104.17 r180 top
R126 "0" R0402 69.36,106.92 r270 bottom
R127 "0" R0402 46.92,107.19 r0 top
R128 "0" R0402 66.06,108.75 r270 top
R129 "0" R0402 59.31,108.46 r180 top
R130 "0" R0402 66.06,106.92 r270 bottom
R131 "0" R0402 63.11,106.27 r0 top
R132 "0" R0402 66.16,104.62 r270 top
R133 "0" R0402 59.31,105.12 r180 top
R134 "0" R0402 67.16,104.67 r270 bottom
R135 "1.1 k" R0402 59.31,101.967 r180 bottom
R136 "1.1 k" R0402 59.31,100.97 r180 bottom
X1 "USB4105-GF-A" USB4105-GF-A 98.939,118.672 r180 top
X2 "484080003" 484080003 82.21,120.625 r180 top
X3 "S3B-PH-SM4-TB(LF)(SN)" JST_S3B-PH-SM4-TB_LF_SN 110.81,108.886 r90 top
X4 "SM12B-GHS-TB(LF)(SN)" JST_SM12B-GHS-TB_LF_SN 69.446,83.922 r0 top
X5 "CONN_1x4" DS1021-1x4 53.76,98.17 r270 top
X6 "532611471" 532611471 39.735,96.188 r270 top
XW1 "U.FL-R-SMT-1(60)" UFL_R_SMT_1 46.36,86.32 r90 top

## Footprints (in the part's own frame and the unit in brackets; to place one, negate y for a bottom-side part, rotate by r counter-clockwise, add the part's x,y. Pads: shape width x height; smd on the part's side, far side on the other; paste and mask are expansions set on the pad)
484080003 [mm]
  round 1 hole 0.7 paste-2539.97 mask+0.05: 1(-3.5,-0.75) 2(-1,-0.75) 3(1,-0.75) 4(3.5,-0.75) 5(4,0.75) 6(2,0.75) 7(0,0.75) 8(-2,0.75) 9(-4,0.75)
  round 3 hole 2.3 paste-2539.97 mask+0.5: SH(-6.57,-0.65) SH(6.57,-0.65)
  silkscreen extent -7.17,-4.33 7.17,2.8, body extent -7.82,-4.09 7.78,2.83, height 16.3
532611471 [mm]
  rect 0.8x1.6 smd paste+0 mask+0.05: 1(-8.125,1.45) 2(-6.875,1.45) 3(-5.625,1.45) 4(-4.375,1.45) 5(-3.125,1.45) 6(-1.875,1.45) 7(-0.625,1.45) 8(0.625,1.45) 9(1.875,1.45) 10(3.125,1.45) 11(4.375,1.45) 12(5.625,1.45) 13(6.875,1.45) 14(8.125,1.45)
  rect 2.1x3 smd paste+0 mask+0.05: MP1(-10.675,-1.45) MP2(10.675,-1.45)
  silkscreen extent -12,-3.85 12,3.45, body extent -11.32,-3.45 11.32,1.75, height 3.4
BQ_SMD1610-2P [mm]
  rect 0.5x1 smd paste+0 mask+0.05: 1(-0.55,0) 2(0.55,0)
  silkscreen extent -1.04,-0.84 0.8,0.84, body extent -0.8,-0.5 0.8,0.5, height 0.45
BQ_SMD1612-4P [mm]
  rect 0.75x0.65 smd paste-2539.97 mask+0.05: 1(-0.525,-0.375) 2(0.525,-0.375) 3(0.525,0.375) 4(-0.525,0.375)
  silkscreen extent -1.14,-1.02 1.14,1.02, body extent -0.83,-0.64 0.83,0.64, height 0.45
C0402 [mm] "Chip Capacitor, Body 1.0x0.5mm, IPC Medium Density"
  rrect25% 0.6x0.6 smd mask+0.05: 1(-0.5,0) 2(0.5,0)
  Top Layer pour cut-out: -0.125,0.35 0.125,0.35 0.154,0.344 0.178,0.328 0.194,0.304 0.2,0.275 0.2,0.275 0.2,-0.275 0.194,-0.304 0.178,-0.328 0.154,-0.344 0.125,-0.35 0.125,-0.35 -0.125,-0.35 -0.154,-0.344 -0.178,-0.328 -0.194,-0.304 -0.2,-0.275 -0.2,-0.275 -0.2,0.275 -0.194,0.304 -0.178,0.328 -0.154,0.344 -0.125,0.35
  silkscreen extent -1.11,-0.54 1.11,0.54, body extent -0.5,-0.25 0.5,0.25, height 0.5
C0603 [mm] "Chip Capacitor, Body 1.6x0.8mm, IPC Medium Density"
  rrect25% 1x1 smd: 1(-0.8,0) 2(0.8,0)
  Top Layer pour cut-out: -0.1,0.5 0.1,0.5 0.148,0.491 0.188,0.463 0.215,0.423 0.225,0.375 0.225,0.375 0.225,-0.375 0.208,-0.438 0.162,-0.483 0.1,-0.5 0.1,-0.5 -0.1,-0.5 -0.162,-0.483 -0.208,-0.438 -0.225,-0.375 -0.225,-0.375 -0.225,0.375 -0.215,0.423 -0.188,0.463 -0.148,0.491 -0.1,0.5
  silkscreen extent -1.6,-0.75 1.6,0.75, body extent -0.8,-0.4 0.8,0.4, height 0.8
DS1021-1x4 [mm] "Connfly DS1021-1x4 SF11 vertical pin header"
  rect 1.22x1.22 hole 1.02 paste-2539.97 mask+0.05: 1(-3.81,0)
  round 1.22 hole 1.02 paste-2539.97 mask+0.05: 2(-1.27,0) 3(1.27,0) 4(3.81,0)
  silkscreen extent -6.35,-1.25 5.08,1.25, body extent -5.08,-1.25 5.08,1.25, height 8.6
DSBGA_TI_BQ25180YBGR [mm] "Battery charger BQ25180YBGR, single-cell Li-ion, I2C, DSBGA8"
  round 0.23 smd paste+0 mask+0.05: A1(-0.2,0.6) A2(0.2,0.6) B1(-0.2,0.2) B2(0.2,0.2) C1(-0.2,-0.2) C2(0.2,-0.2) D1(-0.2,-0.6) D2(0.2,-0.6)
  silkscreen extent -1.38,-0.94 0.67,1.15, body extent -0.53,-0.8 0.53,0.8, height 0.5
FB0603 [mm] "FBMH1608HM470-T"
  rect 1x1 smd paste+0 mask+0.05: 1(-1,0) 2(1,0)
  silkscreen extent -1.13,-0.4 0.22,1.1, body extent -0.85,-0.45 0.85,0.45, height 0.9
GQ_SMD1612-4P [mm]
  rect 0.6x0.5 smd paste-2539.97 mask+0.05: 1(-0.525,-0.375) 2(0.525,-0.375) 3(0.525,0.375) 4(-0.525,0.375)
  silkscreen extent -1.14,-1.02 1.14,1.02, body extent -0.83,-0.64 0.83,0.64, height 0.45
IND3.3x3.3 [mm]
  rect 0.6x2.65 smd paste-2 mask+0: 1(-1.55,0) 2(1.55,0)
  Top Layer region: 1.85,1.325 1.85,-1.325 1.325,-1.85 0.8,-1.85 0.8,-0.885 1.25,-0.44 1.25,0.44 0.8,0.885 0.8,1.85 1.325,1.85
  Top Layer region: -0.8,0.885 -1.25,0.44 -1.25,-0.44 -0.8,-0.885 -0.8,-1.85 -1.325,-1.85 -1.85,-1.325 -1.85,1.325 -1.325,1.85 -0.8,1.85
  silkscreen extent -2.1,-1.65 0.47,2.1, body extent -1.7,-1.7 1.7,1.7, height 1.4
IND0402 [mm] "LQG15HS10NJ02D"
  rect 0.5x0.5 smd paste+0 mask+0.05: 1(-0.45,0) 2(0.45,0)
  silkscreen extent -0.5,-0.53 0.5,0.53, body extent -0.53,-0.28 0.53,0.28, height 0.55
IND0805 [mm] "LQM21PN2R2MGHL"
  rect 0.9x1 smd paste+0 mask+0.05: 1(-1.05,0) 2(1.05,0)
  silkscreen extent -0.32,-0.63 0.32,0.63, body extent -1.07,-0.7 1.07,0.7, height 1
JST_S3B-PH-SM4-TB_LF_SN [mm]
  rect 1x3.5 smd paste+0 mask+0.05: 1(-2,3.45) 2(0,3.45) 3(2,3.45)
  rect 1.5x3.4 smd paste+0 mask+0.05: MP1(-4.35,-2.3) MP1(4.35,-2.3)
  silkscreen extent -5.5,-4.35 5.5,5.97, body extent -4.95,-4 4.95,4.6, height 5.5
JST_SM12B-GHS-TB_LF_SN [mm]
  rect 0.6x1.7 smd paste+0 mask+0.05: 1(-6.875,2.275) 2(-5.625,2.275) 3(-4.375,2.275) 4(-3.125,2.275) 5(-1.875,2.275) 6(-0.625,2.275) 7(0.625,2.275) 8(1.875,2.275) 9(3.125,2.275) 10(4.375,2.275) 11(5.625,2.275) 12(6.875,2.275)
  rect 1x2.7 smd paste+0 mask+0.05: MP1(-8.725,-0.925) MP1(8.725,-0.925)
  silkscreen extent -9.65,-2.62 9.65,3.89, body extent -9.13,-2.42 9.13,2.42, height 4.25
LED1608 [mm] "Kingbright APT1608, 1.6x0.8 mm, cathode left"
  rect 0.8x0.8 smd paste+0 mask+0.05: 1(-0.825,0) 2(0.825,0)
  silkscreen extent -1.8,-0.7 1.5,0.7, body extent -0.81,-0.4 0.8,0.4, height 0.63
R0402 [mm]
  rect 0.5x0.6 smd mask+0.05: 1(-0.45,0) 2(0.45,0)
  silkscreen extent -0.93,-0.54 0.92,0.54, body extent -0.5,-0.25 0.5,0.25, height 0.34
R0805 [mm]
  rect 1.2x1.5 smd: 1(-1,0) 2(1,0)
  silkscreen extent -1.9,-1 1.9,1, body extent -1,-0.62 1,0.63, height 0.6
SOIC-8_5.28x5.28_P1.27 [mm] "NOR Flash W25Q64JVSSIQ, 64Mbit, SPI/Quad SPI, SOIC8"
  rect 1.6x0.6 smd paste+0 mask+0.05: 1(-3.6,1.905) 2(-3.6,0.635) 3(-3.6,-0.635) 4(-3.6,-1.905) 5(3.6,-1.905) 6(3.6,-0.635) 7(3.6,0.635) 8(3.6,1.905)
  silkscreen extent -5.25,-2.79 2.79,3.04, body extent -3.95,-2.64 3.95,2.64, height 2.16
SQFN-36_6X6_P0.5_EP3.7X3.7 [mm] "SQFN-36, 6X6mm BODY, 36P, P0.5mm, EP3.7X3.7mm, SMT"
  rect 0.9x0.28 smd paste+0 mask+0.05: 1(-2.75,2) 2(-2.75,1.5) 3(-2.75,1) 4(-2.75,0.5) 5(-2.75,0) 6(-2.75,-0.5) 7(-2.75,-1) 8(-2.75,-1.5) 9(-2.75,-2) 19(2.75,-2) 20(2.75,-1.5) 21(2.75,-1) 22(2.75,-0.5) 23(2.75,0) 24(2.75,0.5) 25(2.75,1) 26(2.75,1.5) 27(2.75,2)
  rect 0.28x0.9 smd paste+0 mask+0.05: 10(-2,-2.75) 11(-1.5,-2.75) 12(-1,-2.75) 13(-0.5,-2.75) 14(0,-2.75) 15(0.5,-2.75) 16(1,-2.75) 17(1.5,-2.75) 18(2,-2.75) 28(2,2.75) 29(1.5,2.75) 30(1,2.75) 31(0.5,2.75) 32(0,2.75) 33(-0.5,2.75) 34(-1,2.75) 35(-1.5,2.75) 36(-2,2.75)
  rect 3.7x3.7 smd paste-10 mask+0.05: EP(0,0)
  silkscreen extent -4.15,-3.5 3.5,3.5, body extent -3.05,-3.05 3.05,3.05, height 1
TDFN-8_2x2_P0.5_EP0.8x1.38 [mm] "Fuel gauge MAX17048G+T10, single-cell Li-ion, I2C, TDFN8"
  rect 0.7x0.3 smd paste+0 mask+0.05: 1(-0.99,0.75) 2(-0.99,0.25) 3(-0.99,-0.25) 4(-0.99,-0.75) 5(0.99,-0.75) 6(0.99,-0.25) 7(0.99,0.25) 8(0.99,0.75)
  rect 0.8x1.38 smd paste-10 mask+0.05: EP(0,0)
  silkscreen extent -2.19,-1.15 0.36,1.4, body extent -1.05,-1.05 1.05,1.05, height 0.8
UFBGA-121_6x6_P0.5 [mm] "UFBGA-121, 6x6mm body, P0.5mm, ST B0CU, NSMD D0.225"
  round 0.25 smd paste-2539.97 mask+0.05: A1(-2.5,2.5) A2(-2,2.5) A3(-1.5,2.5) A4(-1,2.5) A5(-0.5,2.5) A6(0,2.5) A7(0.5,2.5) A8(1,2.5) A9(1.5,2.5) A10(2,2.5) A11(2.5,2.5) B1(-2.5,2) B2(-2,2) B3(-1.5,2) B4(-1,2) B5(-0.5,2) B6(0,2) B7(0.5,2) B8(1,2) B9(1.5,2) B10(2,2) B11(2.5,2) C1(-2.5,1.5) C2(-2,1.5) C3(-1.5,1.5) C4(-1,1.5) C5(-0.5,1.5) C6(0,1.5) C7(0.5,1.5) C8(1,1.5) C9(1.5,1.5) C10(2,1.5) C11(2.5,1.5) D1(-2.5,1) D2(-2,1) D3(-1.5,1) D4(-1,1) D5(-0.5,1) D6(0,1) D7(0.5,1) D8(1,1) D9(1.5,1) D10(2,1) D11(2.5,1) E1(-2.5,0.5) E2(-2,0.5) E3(-1.5,0.5) E4(-1,0.5) E5(-0.5,0.5) E6(0,0.5) E7(0.5,0.5) E8(1,0.5) E9(1.5,0.5) E10(2,0.5) E11(2.5,0.5) F1(-2.5,0) F2(-2,0) F3(-1.5,0) F4(-1,0) F5(-0.5,0) F6(0,0) F7(0.5,0) F8(1,0) F9(1.5,0) F10(2,0) F11(2.5,0) G1(-2.5,-0.5) G2(-2,-0.5) G3(-1.5,-0.5) G4(-1,-0.5) G5(-0.5,-0.5) G6(0,-0.5) G7(0.5,-0.5) G8(1,-0.5) G9(1.5,-0.5) G10(2,-0.5) G11(2.5,-0.5) H1(-2.5,-1) H2(-2,-1) H3(-1.5,-1) H4(-1,-1) H5(-0.5,-1) H6(0,-1) H7(0.5,-1) H8(1,-1) H9(1.5,-1) H10(2,-1) H11(2.5,-1) J1(-2.5,-1.5) J2(-2,-1.5) J3(-1.5,-1.5) J4(-1,-1.5) J5(-0.5,-1.5) J6(0,-1.5) J7(0.5,-1.5) J8(1,-1.5) J9(1.5,-1.5) J10(2,-1.5) J11(2.5,-1.5) K1(-2.5,-2) K2(-2,-2) K3(-1.5,-2) K4(-1,-2) K5(-0.5,-2) K6(0,-2) K7(0.5,-2) K8(1,-2) K9(1.5,-2) K10(2,-2) K11(2.5,-2) L1(-2.5,-2.5) L2(-2,-2.5) L3(-1.5,-2.5) L4(-1,-2.5) L5(-0.5,-2.5) L6(0,-2.5) L7(0.5,-2.5) L8(1,-2.5) L9(1.5,-2.5) L10(2,-2.5) L11(2.5,-2.5)
  silkscreen extent -3.8,-3 3,3.8, body extent -3.08,-3.08 3.08,3.08, height 0.6
UFL_R_SMT_1 [mm]
  rect 1x1.05 smd paste+0 mask+0.05: 1(0,-1.525)
  rect 1.05x2.2 smd paste+0 mask+0.05: 2(-1.475,0) 2(1.475,0)
  silkscreen extent -1.54,-2.34 1.3,2.34, body extent -1.5,-1.55 1.5,1.55, height 1.25
USB4105-GF-A [mm] "USB-C USB2.0 receptacle, 16 contacts / 12 signal lands, hybrid SMT/THT"
  rect 0.6x1.15 smd mask-2539.97: A1/B12(-3.2,0) B1/A12(3.2,0) B4/A9(2.4,0)
  rect 0.6x1.15 smd paste+0 mask+0.05: A4/B9(-2.4,0)
  rect 0.3x1.15 smd mask-2539.97: A5(-1.25,0) A6(-0.25,0) A7(0.25,0) A8(1.25,0) B5(1.75,0) B6(0.75,0) B7(-0.75,0) B8(-1.75,0)
  oval 1x2.1 hole 0.6 slot 1.7 at 90 deg paste-2539.97 mask+0: SH(-4.32,-0.575) SH(4.32,-0.575)
  oval 1x1.8 hole 0.6 slot 1.4 at 90 deg paste-2539.97 mask+0: SH(-4.32,-4.755) SH(4.32,-4.755)
  round 0 hole 0.65 unplated paste-2539.97 mask+0.1: ""(-2.89,-1.075) ""(2.89,-1.075)
  silkscreen extent -5.77,-7.44 4.83,0.77, body extent -4.47,-7.3 4.47,0.41, height 3.31
WSON-12_3x2_P0.5_EP0.9x2 [mm] "Buck regulator TPS62740DSSR, 300mA, WSON12"
  rect 0.5x0.25 smd paste+0 mask+0.05: 1(-0.95,1.25) 2(-0.95,0.75) 3(-0.95,0.25) 4(-0.95,-0.25) 5(-0.95,-0.75) 6(-0.95,-1.25) 7(0.95,-1.25) 8(0.95,-0.75) 9(0.95,-0.25) 10(0.95,0.25) 11(0.95,0.75) 12(0.95,1.25)
  rect 0.9x2 smd paste-10 mask+0.05: 13(0,0)
  silkscreen extent -2.05,-1.65 0.42,1.9, body extent -1,-1.5 1,1.5, height 0.8

## Part data
BQ1: library part NX1610SE-32.768KHZ-EXS00A-MU01501, "XTAL, NX1610SE-32.768KHZ-EXS00A-MU01501, 32.768 kHz, CL 6 pF, 2P, 1.6x1.0 mm", Frequency Tolerance="+/-20 ppm", Load Capacitance="6 pF", Manufacturer=NDK, Package="1.6x1.0 mm", ComponentLink1Description="Manufacturer documentation", ComponentLink1URL=https://www.ndk.com/en/products/upload/lineup/pdf/NDKX01-00011_en.pdf, Device Type=Crystal, Frequency="32.768 kHz", ID=BQ_000002, Manufacturer Part Number=NX1610SE-32.768KHZ-EXS00A-MU01501, Mounting Technology=SMD, Part Number=NX1610SE-32.768KHZ-EXS00A-MU01501
BQ2: library part NX1612SA-32MHZ-EXS00A-CS09166, "XTAL, NX1612SA-32MHZ-EXS00A-CS09166, 32 MHz, CL 8 pF, 4P, 1.6x1.2 mm", Frequency Tolerance="+/-10 ppm", Load Capacitance="8 pF", Manufacturer=NDK, Package="1.6x1.2 mm", ComponentLink1Description="ST reference design, AN5948", ComponentLink1URL=https://www.st.com/resource/en/application_note/an5948-how-to-develop-rf-hardware-using-stm32wba-mcus-stmicroelectronics.pdf, Device Type=Crystal, Frequency="32 MHz", ID=BQ_000003, Manufacturer Part Number=NX1612SA-32MHZ-EXS00A-CS09166, Mounting Technology=SMD, Part Number=NX1612SA-32MHZ-EXS00A-CS09166
C1 C4 C19 C44: library part "C0402 X7R 4.7 uF 10% 25 V", "MLCC 0402, X7R, 4.7 uF, 10%, 16 V", Capacitance="4.7 uF", Dielectric=X7R, Package=C0402, Temperature Range="-55...+125 C", Tolerance=10%, Voltage Rating="16 V", ID=C_001115, Mounting Technology=SMD, Part Number="C0402 X7R 4.7 uF 10% 25 V"
C2 C3 C5 C6 C7 C9 C17 C18 C21 C22 C23 C27 C28 C29 C30 C31 C32 C33 C35 C36 C38 C39 C40 C43 C45: library part "C0402 X7R 100 nF 10% 16 V", "MLCC 0402, X7R, 100 nF, 10%, 16 V", Capacitance="100 nF", Dielectric=X7R, Package=C0402, Temperature Range="-55...+125 C", Tolerance=10%, Voltage Rating="16 V", ID=C_000136, Mounting Technology=SMD, Part Number="C0402 X7R 100 nF 10% 16 V"
C8 C11 C25 C34 C37: library part "C0402 X7R 1 uF 10% 16 V", "MLCC 0402, X7R, 1 uF, 10%, 16 V", Capacitance="1 uF", Dielectric=X7R, Package=C0402, Temperature Range="-55...+125 C", Tolerance=10%, Voltage Rating="16 V", ID=C_000148, Mounting Technology=SMD, Part Number="C0402 X7R 1 uF 10% 16 V"
C10 C20: library part "C0402 X7R 2.2 uF 10% 16 V", "MLCC 0402, X7R, 2.2 uF, 10%, 16 V", Capacitance="2.2 uF", Dielectric=X7R, Package=C0402, Temperature Range="-55...+125 C", Tolerance=10%, Voltage Rating="16 V", ID=C_001116, Mounting Technology=SMD, Part Number="C0402 X7R 2.2 uF 10% 16 V"
C12 C13 C16 C26: library part "C0603 X7R 10 uF 10% 16 V", "MLCC 0603, X7R, 10 uF, 10%, 16 V", Capacitance="10 uF", Dielectric=X7R, Package=C0603, Temperature Range="-55...+125 C", Tolerance=10%, Voltage Rating="16 V", ID=C_001120, Mounting Technology=SMD, Part Number="C0603 X7R 10 uF 10% 16 V"
C14 C15: library part "C0603 X7R 1 uF 10% 16 V", "MLCC 0603, X7R, 1 uF, 10%, 16 V", Capacitance="1 uF", Dielectric=X7R, Package=C0603, Temperature Range="-55...+125 C", Tolerance=10%, Voltage Rating="16 V", ID=C_000390, Mounting Technology=SMD, Part Number="C0603 X7R 1 uF 10% 16 V"
C24: library part "C0402 X7R 470 nF 10% 16 V", "MLCC 0402, X7R, 470 nF, 10%, 16 V", Capacitance="470 nF", Dielectric=X7R, Package=C0402, Temperature Range="-55...+125 C", Tolerance=10%, Voltage Rating="16 V", ID=C_000144, Mounting Technology=SMD, Part Number="C0402 X7R 470 nF 10% 16 V"
C41 C42: library part "C0402 NPO 6 pF ±0.25 pF 50 V", "MLCC 0402, NP0, 6 pF, ±0.25 pF, 50 V", Capacitance="6 pF", Package=C0402, ID=C_001121, Mounting Technology=SMD, Part Number="C0402 NPO 6 pF ±0.25 pF 50 V", Simulation ModelName="±0.25 pF", Simulation PortMap=(1:1),(2:2)
C46: library part "C0402 NP0 1.5 pF ±0.25 pF 50 V", "MLCC 0402, NP0, 1.5 pF, ±0.25 pF, 50 V", Package=C0402, Capacitance="1.5 pF", ComponentLink1Description="Reference MPN: GRM1555C1H1R5CA01D", ComponentLink1URL=https://www.digikey.com/en/products/detail/murata-electronics/GRM1555C1H1R5CA01D/3481886, ID=C_001117, Mounting Technology=SMD, Part Number="C0402 NP0 1.5 pF ±0.25 pF 50 V", Simulation ModelName="±0.25 pF", Simulation PortMap=(1:1),(2:2)
C47: library part "C0402 NP0 3.9 pF ±0.25 pF 50 V", "MLCC 0402, NP0, 3.9 pF, ±0.25 pF, 50 V", Package=C0402, Capacitance="3.9 pF", ComponentLink1Description="Reference MPN: GRM1555C1H3R9CA01D", ComponentLink1URL=https://www.digikey.com/en/products/detail/murata-electronics/GRM1555C1H3R9CA01D/3693851, ID=C_001118, Mounting Technology=SMD, Part Number="C0402 NP0 3.9 pF ±0.25 pF 50 V", Simulation ModelName="±0.25 pF", Simulation PortMap=(1:1),(2:2)
C48: library part "C0402 NP0 2.7 pF ±0.25 pF 50 V", "MLCC 0402, NP0, 2.7 pF, ±0.25 pF, 50 V", Package=C0402, Capacitance="2.7 pF", ComponentLink1Description="Reference MPN: GRM1555C1H2R7CA01D", ComponentLink1URL=https://www.digikey.com/en/products/detail/murata-electronics/GRM1555C1H2R7CA01D/3721291, ID=C_001119, Mounting Technology=SMD, Part Number="C0402 NP0 2.7 pF ±0.25 pF 50 V", Simulation ModelName="±0.25 pF", Simulation PortMap=(1:1),(2:2)
DD1: "IC, USB HUB CONTROLLER, USB2532, USB 2.0 HI-SPEED 2-PORT, I2C/SMBUS, SQFN36, 36P, P0.5mm", Manufacturer=Microchip, Package=SQFN36, Channel Count=2, ComponentLink1Description="Manufacturer documentation", ComponentLink1URL=https://ww1.microchip.com/downloads/aemDocuments/documents/UNG/ProductDocuments/DataSheets/USB2532-Data-Sheet-DS00001701.pdf, Data Rate="480 Mbit/s", Interface Type="USB 2.0", Mounting Technology=SMT, Part Number=USB2532
DD2: "IC, BUCK REGULATOR, TPS62740DSSR, VIN 2.2-5.5V, VOUT 1.8-3.3V, 300mA, WSON12, 12PIN+EP, P0.5mm", Manufacturer="Texas Instruments", Package=WSON-12, ComponentLink1Description=Datasheet, ComponentLink1URL=https://www.ti.com/lit/ds/symlink/tps62740.pdf, ID=ICPWR_000002, Manufacturer Part Number=TPS62740DSSR, Mounting Technology=SMT, Part Number=TPS62740DSSR
DD3: "IC, BATTERY CHARGER, BQ25180YBGR, 1CELL LI-ION, 1A, I2C, POWER PATH, DSBGA8, 8P, P0.4mm", Manufacturer="Texas Instruments", Package=DSBGA, ComponentLink1Description=Datasheet, ComponentLink1URL=https://www.ti.com/lit/ds/symlink/bq25180.pdf, ID=ICPWR_000001, Manufacturer Part Number=BQ25180YBGR, Mounting Technology=SMT, Part Number=BQ25180YBGR
DD4: "IC, FUEL GAUGE, MAX17048G+T10, 1CELL LI-ION, I2C, TDFN8, 8P, P0.5mm", Manufacturer="Analog Devices", Package=TDFN-8, ComponentLink1Description=Datasheet, ComponentLink1URL=https://www.analog.com/media/en/technical-documentation/data-sheets/MAX17048-MAX17049.pdf, ID=ICPWR_000003, Manufacturer Part Number=MAX17048G+T10, Mounting Technology=SMT, Part Number=MAX17048G+T10
DD5: "IC, WIRELESS MCU, STM32WBA65PII6, CORTEX-M33, FPU, 100MHz, FLASH 2MB, RAM 512KB, BLE/IEEE 802.15.4, UFBGA121, 121P, P0.5mm, SMT", Manufacturer=STMicroelectronics, Max Frequency="100 MHz", Package="UFBGA121 6x6 mm, pitch 0.5 mm", Supply Voltage="VDD 1.71-3.6 V; see supply-domain conditions", Architecture="32-bit Armv8-M", ComponentLink1Description="ST datasheet DS14736 Rev 3", ComponentLink1URL=https://www.st.com/resource/en/datasheet/stm32wba65pi.pdf, Core="Arm Cortex-M33 with FPU", Flash="2 MB", GPIO Count=86, ID=ICMCU_000007, Manufacturer Part Number=STM32WBA65PII6, Mounting Technology=SMT, Part Number=STM32WBA65PII6, RAM="512 KB"
DD6: "IC, NOR FLASH, W25Q64JVSSIQ, 64Mbit, SPI/DUAL SPI/QUAD SPI, 2.7-3.6V, SOIC8 208MIL, 8P, P1.27mm", Manufacturer=Winbond, Package=SOIC-8, ComponentLink1Description=Datasheet, ComponentLink1URL=https://docs.rs-online.com/53b3/0900766b8162304e.pdf, ID=ICMEM_000001, Manufacturer Part Number=W25Q64JVSSIQ, Mounting Technology=SMT, Part Number=W25Q64JVSSIQ
FB1 FB2: library part FBMH1608HM470-T, "FERRITE BEAD, FBMH1608HM470-T, 47 Ohm @ 100 MHz, 25%, 3.5 A, DCR 20 mOhm max, 0603", Manufacturer="Taiyo Yuden", Package=0603, Rated Current="3.5 A", Test Frequency="100 MHz", ComponentLink1Description="Manufacturer datasheet", ComponentLink1URL=https://mm.digikey.com/Volume0/opasdata/d220001/medias/docus/3530/FBMH1608HM470-T_SS.pdf, DCR="20 mOhm max", ID=FB_000001, Impedance="47 Ohm", Manufacturer Part Number=FBMH1608HM470-T, Mounting Technology=SMD, Part Number=FBMH1608HM470-T
GQ1: library part ASCO7-24.000MHZ-LR-T, "OSC, XO, ASCO7-24.000MHZ-LR-T, 24 MHz, 1.2 V, CMOS, +/-25 ppm, 1.6x1.2 mm", Manufacturer=Abracon, Package="1.6x1.2 mm", Supply Voltage="1.2 V", ComponentLink1Description="Manufacturer documentation", ComponentLink1URL=https://abracon.com/datasheets/ASCO7.pdf, Device Type=XO, Frequency="24 MHz", ID=GQ_000002, Manufacturer Part Number=ASCO7-24.000MHZ-LR-T, Mounting Technology=SMD, Output Type=CMOS, Part Number=ASCO7-24.000MHZ-LR-T
HL1 HL2: "LED, INDICATOR, APT1608CGCK, GREEN, 570 nm, 0603", Forward Current="20 mA (test)", Forward Voltage="2.1 V typ @ 20 mA", Manufacturer=Kingbright, Package="0603 (1608 Metric)", ComponentLink1Description="Manufacturer datasheet", ComponentLink1URL=https://www.kingbrightusa.com/images/catalog/SPEC/APT1608CGCK.pdf, ID=OPTO_000002, Luminous Intensity="50 mcd typ @ 20 mA", Manufacturer Part Number=APT1608CGCK, Mounting Technology=SMD, Optoelectronic Type="LED, GREEN", Part Number=APT1608CGCK, Wavelength="570 nm dominant"
HL3: "LED, INDICATOR, APT1608SURCK, RED, 630 nm, 0603", Forward Current="20 mA (test)", Forward Voltage="1.95 V typ @ 20 mA", Manufacturer=Kingbright, Package="0603 (1608 Metric)", ComponentLink1Description="Manufacturer datasheet", ComponentLink1URL=https://www.kingbrightusa.com/images/catalog/SPEC/APT1608SURCK.pdf, ID=OPTO_000001, Luminous Intensity="80 mcd typ @ 20 mA", Manufacturer Part Number=APT1608SURCK, Mounting Technology=SMD, Optoelectronic Type="LED, RED", Part Number=APT1608SURCK, Wavelength="630 nm dominant"
L1: library part LPS3314-222MRC, "INDUCTOR, PWR,LPS3314-222MRC, 2.2 uH, 100 mOhm max, 3.3x3.3", Inductor Type="Multilayer power, shielded", Manufacturer=CoilCraft, Package=3.3x3.3, Saturation Current="1.3 A", ComponentLink1Description="Vendor datasheet", ComponentLink1URL=https://www.mouser.de/datasheet/3/995/1/lps3314.pdf, DCR="100 mOhm max", ID=L_000004, Inductance="2.2 uH", Manufacturer Part Number=LPS3314-222MRC, Mounting Technology=SMD, Part Number=LPS3314-222MRC
L2: library part LQM21PN2R2MGHL, "INDUCTOR, POWER, LQM21PN2R2MGHL, 2.2 uH, 20%, 0.45 A Isat, 1.3 A Itemp, DCR 156 mOhm max, 0805", Inductor Type="Multilayer power, shielded", Manufacturer=Murata, Package=0805, Rated Current="1.3 A", Saturation Current="0.45 A", Tolerance=20%, ComponentLink1Description="Manufacturer datasheet", ComponentLink1URL=https://cdn.promelec.ru/upload/items/2024/02/21/LQM21PN2R2MGHL.pdf, DCR="156 mOhm max", ID=L_000001, Inductance="2.2 uH", Manufacturer Part Number=LQM21PN2R2MGHL, Mounting Technology=SMD, Part Number=LQM21PN2R2MGHL, SRF="40 MHz min"
L3: library part LQG15HS10NJ02D, "INDUCTOR, RF, LQG15HS10NJ02D, 10 nH, 5%, 500 mA, DCR 260 mOhm max, 0402", Inductor Type="Multilayer RF", Manufacturer=Murata, Package=0402, Rated Current="500 mA", Tolerance=5%, ComponentLink1Description="Manufacturer datasheet", ComponentLink1URL=https://www.mantech.co.za/Datasheets/Products/LQG15HS_MURATA.pdf, DCR="260 mOhm max", ID=L_000002, Inductance="10 nH", Manufacturer Part Number=LQG15HS10NJ02D, Mounting Technology=SMD, Part Number=LQG15HS10NJ02D, SRF="3.4 GHz"
L4: library part LQG15HS1N8S02D, "INDUCTOR, RF, LQG15HS1N8S02D, 1.8 nH, ±0.3 nH, 950 mA, DCR 100 mOhm max, 0402", Inductor Type="Multilayer RF", Manufacturer=Murata, Package=0402, Rated Current="950 mA", Tolerance="±0.3 nH", ComponentLink1Description="Product specifications", ComponentLink1URL=https://www.digikey.com/en/products/detail/murata-electronics/LQG15HS1N8S02D/662862, DCR="100 mOhm max", ID=L_000003, Inductance="1.8 nH", Manufacturer Part Number=LQG15HS1N8S02D, Mounting Technology=SMD, Part Number=LQG15HS1N8S02D, SRF="6 GHz"
L5: library part LQG15HS1N3S02D, "INDUCTOR, RF, LQG15HS1N3S02D, 1.3 nH, ±0.3 nH, 1 A, DCR 70 mOhm max, 0402", Inductor Type="Multilayer RF", Manufacturer=Murata, Package=0402, Rated Current="1 A", Tolerance="±0.3 nH", ComponentLink1Description="Product specifications", ComponentLink1URL=https://www.digikey.com/en/products/detail/murata-electronics/LQG15HS1N3S02D/2594217, DCR="70 mOhm max", ID=L_000004, Inductance="1.3 nH", Manufacturer Part Number=LQG15HS1N3S02D, Mounting Technology=SMD, Part Number=LQG15HS1N3S02D, SRF="6 GHz"
R1 R2 R3: library part "R0805 200 Ohm 1%", "SMD resistor 0805, 200 Ohm, 1%", Package=R0805, Resistance="200 Ohm", Tolerance=1%, ID=R_000394, Mounting Technology=SMD, Part Number="R0805 200 Ohm 1%", Technology="Thick Film"
R4: library part "R0402 12 kOhm 1%", "SMD resistor 0402, 12 kOhm, 1%", Package=R0402, Resistance="12 kOhm", Tolerance=1%, ID=R_000099, Mounting Technology=SMD, Part Number="R0402 12 kOhm 1%", Technology="Thick Film"
R5 R6 R7 R8 R105: library part "R0402 10 kOhm 1%", "SMD resistor 0402, 10 kOhm, 1%", Package=R0402, Resistance="10 kOhm", Tolerance=1%, ID=R_000097, Mounting Technology=SMD, Part Number="R0402 10 kOhm 1%", Technology="Thick Film"
R9 R11 R12 R13 R14 R15 R20 R21 R22 R23 R28 R29 R30 R31 R32 R33 R34 R35 R36 R37 R38 R39 R40 R41 R42 R43 R44 R45 R46 R47 R48 R49 R50 R51 R52 R53 R54 R55 R56 R57 R58 R59 R60 R64 R65 R66 R67 R68 R69 R70 R71 R72 R73 R74 R75 R76 R77 R78 R79 R80 R81 R82 R83 R84 R85 R86 R87 R88 R89 R90 R91 R92 R97 R98 R99 R100 R101 R102 R103 R104 R115 R116 R117 R118 R119 R120 R121 R122 R123 R124 R125 R126 R127 R128 R129 R130 R131 R132 R133 R134: library part "R0402 0 Ohm 1%", "SMD resistor 0402, 0 Ohm, 1%", Package=R0402, Tolerance=1%, ID=R_000677, Mounting Technology=SMD, Part Number="R0402 0 Ohm 1%", Resistance=0, Technology="Thick Film"
R10: library part "R0402 82 kOhm 1%", "SMD resistor 0402, 82 kOhm, 1%", Package=R0402, Resistance="82 kOhm", Tolerance=1%, ID=R_000119, Mounting Technology=SMD, Part Number="R0402 82 kOhm 1%", Technology="Thick Film"
R16 R17: library part "R0402 5.1 kOhm 1%", "SMD resistor 0402, 5.1 kOhm, 1%", Package=R0402, Resistance="5.1 kOhm", Tolerance=1%, ID=R_000090, Mounting Technology=SMD, Part Number="R0402 5.1 kOhm 1%", Technology="Thick Film"
R18: library part "R0402 100 kOhm 1%", "SMD resistor 0402, 100 kOhm, 1%", Package=R0402, Resistance="100 kOhm", Tolerance=1%, ID=R_000121, Mounting Technology=SMD, Part Number="R0402 100 kOhm 1%", Technology="Thick Film"
R19 R24 R25 R26 R27 R61 R93 R94 R95 R96 R106 R107 R108 R109 R110 R111 R112 R113 R114: library part "R0402 4.7 kOhm 1%", "SMD resistor 0402, 4.7 kOhm, 1%", Package=R0402, Resistance="4.7 kOhm", Tolerance=1%, ID=R_000089, Mounting Technology=SMD, Part Number="R0402 4.7 kOhm 1%", Technology="Thick Film"
R62 R63 R135 R136: library part "R0402 1.1 kOhm 1%", "SMD resistor 0402, 1.1 kOhm, 1%", Package=R0402, Resistance="1.1 kOhm", Tolerance=1%, ID=R_000074, Mounting Technology=SMD, Part Number="R0402 1.1 kOhm 1%", Technology="Thick Film"
X1: "CONN, USB2.0 TYPE-C, USB4105-GF-A, 16P, P0.5, FEMALE, RA, SMT/THT", Manufacturer=GCT, Package="USB-C 16 contacts; 0.95 mm shell stakes", ComponentLink1Description="Manufacturer datasheet / drawing", ComponentLink1URL=https://gct.co/files/drawings/usb4105.pdf, ID=X_000005, Manufacturer Part Number=USB4105-GF-A, Mounting Technology=SMT/THT, Part Number=USB4105-GF-A
X2: library part 676433910, "USB 2.0 TYPE A, RIGHT-ANGLE, 4 CONTACTS, THROUGH HOLE", Current Rating="1.8 A max", Manufacturer=Molex, Package="Vertical, through hole", Voltage Rating="30 V AC/DC", ComponentLink1Description="Manufacturer documentation", ComponentLink1URL=https://www.molex.com/content/dam/molex/molex-dot-com/products/automated/en-us/salesdrawingpdf/484/48408/484080003_sd.pdf, Connector Type="USB 3.0 Type A, vertical", Contact Count=9, Gender=Receptacle, ID=X_000009, Manufacturer Part Number=484080003, Mounting Technology=THT, Part Number=484080003, Pitch="2.00 / 2.50 mm", Row Count=2
X3: "CONN, WIRE-TO-BOARD, S3B-PH-SM4-TB(LF)(SN), JST PH, 3P, P2.0, MALE, RA, SMD", Current Rating="2 A", Manufacturer=JST, Package="JST PH, side entry", Voltage Rating="100 V", ComponentLink1Description="Manufacturer datasheet", ComponentLink1URL=https://www.jst-mfg.com/product/pdf/eng/ePH.pdf, Connector Type="Wire-to-board header", Contact Count=3, Gender=Male, ID=X_000011, Manufacturer Part Number=S3B-PH-SM4-TB(LF)(SN), Mounting Technology=SMD, Part Number=S3B-PH-SM4-TB(LF)(SN), Pitch="2.0 mm", Row Count=1
X4: "CONN, WIRE-TO-BOARD, SM12B-GHS-TB(LF)(SN), JST GH, 12P, P1.25, MALE, RA, SMD", Current Rating="1 A", Manufacturer=JST, Package="JST GH, side entry", Voltage Rating="50 V", ComponentLink1Description="Manufacturer datasheet", ComponentLink1URL=https://www.jst-mfg.com/product/pdf/eng/eGH.pdf, Connector Type="Wire-to-board header", Contact Count=12, Gender=Male, ID=X_000012, Manufacturer Part Number=SM12B-GHS-TB(LF)(SN), Mounting Technology=SMD, Part Number=SM12B-GHS-TB(LF)(SN), Pitch="1.25 mm", Row Count=1
X5: library part DS1021-1x4, "CONN, PLS, DS1021-1x4, 4P, P2.54, BLACK", ID=X_000003, Part Number=DS1021-1x4
X6: "CONN, PICOBLADE, 532611471, 14P, P1.25, RIGHT ANGLE, NATURAL", Manufacturer=Molex, Package=PicoBlade, ComponentLink1Description="Manufacturer documentation", ComponentLink1URL=https://www.molex.com/en-us/products/part-detail/532611471, Connector Type=PicoBlade, Contact Count=14, Gender=Male, ID=X_000008, Manufacturer Part Number=532611471, Mounting Technology=SMT, Part Number=532611471, Pitch="1.25 mm", Row Count=1
XW1: library part U.FL-R-SMT-1, "CONN, RF COAXIAL, U.FL-R-SMT-1(60), 50 Ohm, VERTICAL, SMD", Manufacturer="Hirose Electric", Package="U.FL, vertical", ComponentLink1Description="Manufacturer catalog", ComponentLink1URL=https://www.hirose.com/en/product/document?documentid=ed_U.FL_CAT&documenttype=Catalog&lang=en&series=U.FL, Connector Type="RF coaxial, U.FL", Gender=Receptacle, ID=X_000010, Manufacturer Part Number=U.FL-R-SMT-1(60), Mounting Technology=SMD, Part Number=U.FL-R-SMT-1

## Via types
v1: diameter 0.25, hole 0.1, Top Layer to Bottom Layer, 179 vias
v2: diameter 0.6, hole 0.3, Top Layer to Bottom Layer, 24 vias
v3: diameter 0.8, hole 0.6, Top Layer to Bottom Layer, 18 vias
v4: diameter 0.6, hole 0.25, Top Layer to Bottom Layer, 7 vias

## Nets (pads, with @x,y where several pads share a name; then routed paths per layer and width w, separated by ;. In a path a pad name is that pad's centre, name@x,y a point inside that pad or via, vN(x,y) a via of type N, cw(c..) or ccw(c..) an arc to the next point about the centre after c; other vN are vias at no path point)
DC-DC_CTRL: R20.2 R122.1
GND: BQ2.2 BQ2.4 C1.2 C2.2 C3.2 C4.2 C5.2 C6.2 C7.2 C8.2 C9.2 C10.2 C11.2 C12.2 C13.2 C14.2 C15.2 C16.2 C17.2 C18.2 C19.2 C20.2 C21.2 C22.2 C23.2 C24.2 C25.2 C26.2 C27.2 C28.2 C29.2 C30.2 C31.2 C32.2 C33.2 C34.2 C35.2 C36.2 C37.2 C38.2 C39.2 C40.2 C41.2 C42.2 C43.2 C44.2 C45.2 C46.2 C47.2 C48.2 DD1.EP DD2.3 DD2.13 DD3.D2 DD4.1 DD4.4 DD4.6 DD4.EP DD5.A10 DD5.B6 DD5.B10 DD5.C2 DD5.C7 DD5.C8 DD5.C10 DD5.D3 DD5.E2 DD5.G6 DD5.G10 DD5.H3 DD5.J3 DD5.J11 DD6.4 GQ1.2 R1.1 R2.1 R3.1 R4.1 R16.1 R17.1 R18.1 R105.1 X1.A1/B12 X1.B1/A12 X1.SH X2.4 X2.7 X2.SH X3.3 X3.MP1 X4.2 X4.MP1 X5.4 X6.2 X6.5 X6.8 X6.14 XW1.2 | length 52.9
  Top Layer w0.08: v1(64.11,100.92) DD5.G10@64.36,100.67 ; v1(64.118,98.427) DD5.C10@64.36,98.67 ; v1(64.127,97.937) DD5.B10@64.36,98.17 ; v1@65.114,98.425 DD5.C8@65.36,98.67 ; v1(65.61,98.42) DD5.C7@65.86,98.67 ; v1(66.11,97.92) DD5.B6@66.36,98.17 ; v1(66.11,100.92) DD5.G6@66.36,100.67 ; DD5.D3@67.86,99.17 v1(68.11,98.92) ; DD5.H3@67.86,101.17 v1(68.11,101.42) ; DD5.J3@67.86,101.67 v1(68.11,101.92) ; DD5.C2@68.36,98.67 v1(68.61,98.42) ; DD5.E2@68.36,99.67 v1(68.61,99.42)
  Top Layer w0.15: C39.2@51.66,97.87 51.66,96.46 X5.4@53.76,94.36 ; C27.2@71.83,103.06 72.383,103.613 72.665,103.613 v1(72.684,103.632) ; v3(96.81,101.114) 96.973,101.276 96.973,101.614 97.532,102.173 DD2.3@98.999,102.173
  Top Layer w0.2: X6.2@41.185,103.063 43.274,103.063 43.511,103.3 C45.2@45.45,103.3 48.9,103.3 49.565,103.965 DD6.4@49.565,105.92 ; C38.2@63.571,88.3 63.821,88.05 X4.2@63.821,86.197 ; C37.2@71.86,99.67 C34.2@71.86,100.8 ; C26.2@72.96,97.075 74.01,97.075 C25.2@74.51,96.575 ; DD4.1@97.861,107.055 97.911,107.105 97.911,107.634 v2(98.321,108.045) ; v2(98.861,108.045) DD4.6@98.861,109.035 ; DD4.EP@98.901,108.045 99.311,107.634 99.311,107.105 DD4.4@99.361,107.055 ; C17.2@99.361,105.684 C17.2@99.611,105.435 ; DD3.D2@102.11,109.386 102.11,107.861 102.685,107.286 C15.2@103.788,107.286
  Top Layer w0.223: GQ1.2@90.085,110.55 90.135,110.55 90.96,111.375 92.01,111.375 C9.2@92.61,110.775
  Bottom Layer w0.2: C29.2@64.61,93.979 C21.2@64.61,95.62
  Bottom Layer w0.223: R16.1@97.189,117.772 R17.1@100.189,117.772
  Bottom Layer w0.4: C13.2@94.685,100.575 96.247,100.575 v3@96.785,101.114 ; C12.2@94.685,102.175 95.885,102.175 96.785,101.276 v3@96.785,101.114 ; v2@99.924,101.475 99.924,101.987 ; v2@99.924,102.444 v2@99.924,102.498 ; v2@99.985,102.559 v2@99.924,102.498 ; v3@96.785,101.114 96.785,101.196 97.645,102.055 99.855,102.055 99.924,101.987 ; 99.924,101.987 v2@99.924,102.498
  other v1: 65.113,98.425
  other v2: 99.949,101.475 99.949,102.498
  other v3: 81.228,106.233 82.41,106.275 83.61,106.325 81.178,107.433 82.36,107.475 83.56,107.525 81.128,108.633 82.31,108.675 83.51,108.725
I2C_4_RST_N: DD1.26 R96.1 R102.1 | length 11
  Top Layer w0.15: v1(58.228,103.982) 58.255,103.982 58.292,103.945 R96.1@58.86,103.945
  Top Layer w0.223: R102.1@58.86,102.946 R96.1@58.86,103.945 ; DD1.26@83.86,104.725 83.86,103.274 84.81,102.324 84.81,95.775
I2C_4_SCL: DD1.24 R24.1 R40.1 | length 29.5
  Top Layer w0.15: v1(69.447,88.87) R24.1@69.447,89.67
  Top Layer w0.223: v1(69.447,88.87) 69.447,88.55 70.253,87.744 77.444,87.744 82.01,92.31 82.01,102.575 82.86,103.425 DD1.24@82.86,104.725
  Bottom Layer w0.15: v1(69.447,88.87) R40.1@69.447,89.67
I2C_4_SDA: DD1.22 R25.1 R41.1 | length 27.1
  Top Layer w0.15: R25.1@70.647,89.67 70.66,89.657 v1(70.66,88.875)
  Top Layer w0.223: v1(70.66,88.875) 71.469,88.066 77.31,88.066 81.399,92.155 81.399,103.579 81.86,104.04 DD1.22@81.86,104.725
  Bottom Layer w0.15: v1@70.647,88.87 R41.1@70.647,89.67
NetBQ1_1: BQ1.1 C41.1 DD5.K4 | length 4.6
  Top Layer w0.08: DD5.K4@67.36,102.17 v1(67.61,102.42)
  Bottom Layer w0.15: v1(67.61,102.42) 68.46,103.27 68.46,103.57 68.76,103.87 BQ1.1@69.66,103.87 69.825,104.035 C41.1@71.06,104.035
NetBQ1_2: BQ1.2 C42.1 DD5.L4 | length 5.3
  Top Layer w0.08: DD5.L4@67.36,102.67 v1(67.61,102.92)
  Bottom Layer w0.15: v1(67.61,102.92) 68.16,103.47 68.16,104.47 68.66,104.97 C42.1@71.091,104.97
NetBQ2_1: BQ2.1 DD5.A8 | length 5.7
  Top Layer w0.08: BQ2.1@64.235,92.77 64.78,92.77 65.36,93.35 DD5.A8@65.36,97.67
NetBQ2_3: BQ2.3 DD5.B8 | length 5.5
  Top Layer w0.08: BQ2.3@63.485,93.82 63.485,94.671 63.841,95.027 64.517,95.027 65.115,95.625 65.115,97.925 DD5.B8@65.36,98.17
NetC11_1: C11.1 DD1.27 R10.2 R18.2 | length 16.7
  Top Layer w0.223: DD1.27@84.36,104.725 84.66,104.725 v4(85.31,104.075)
  Bottom Layer w0.223: v4(85.31,104.075) 85.31,105.875 89.71,110.275 93.66,110.275 94.61,111.225 R18.2@94.61,111.275 R10.2@94.61,113.375
NetC19_1: C19.1 C20.1 C21.1 C22.1 DD5.A5 DD5.B9 FB1.2 L2.1 | length 16.9
  Top Layer w0.08: v1(64.61,97.92) DD5.B9@64.86,98.17 ; DD5.A5@66.86,97.67 v1(67.11,97.42)
  Bottom Layer w0.15: C21.1@64.61,96.62 64.64,96.65 64.64,97.863 64.61,97.893 v1(64.61,97.92) ; v1(67.11,97.42) 67.39,97.14 67.597,97.14 C22.1@68.067,96.67
  Bottom Layer w0.2: C21.1@64.61,96.62 65.26,95.97 65.26,94.77 66.16,93.87 ; C22.1@68.067,96.67 67.526,96.129 67.526,95.236 66.16,93.87 ; 71.46,92.57 C19.1@68.96,92.57 C20.1@67.86,92.57 FB1.2@66.16,92.57 66.16,93.87
NetC23_1: C23.1 DD5.A7 R36.1 R43.1 | length 9.2
  Top Layer w0.15: DD5.A7@65.86,97.67 65.86,96.554 C23.1@66.367,96.046 65.825,95.504 65.825,91.855 67.06,90.62 R43.1@67.06,90.57 R36.1@68.26,90.57
NetC24_1: C24.1 DD5.B7 | length 1.7
  Top Layer w0.08: v1(65.61,97.92) DD5.B7@65.86,98.17
  Bottom Layer w0.15: v1(65.61,97.92) 65.86,97.67 C24.1@65.86,96.67
NetC26_1: C26.1 DD5.B1 FB2.2 | length 4.5
  Top Layer w0.15: DD5.B1@68.86,98.17 68.879,98.151 68.983,98.151 68.994,98.14 70.295,98.14 C26.1@71.36,97.075 FB2.2@71.36,95.575
NetC27_1: C27.1 DD5.K1 R37.1 | length 3.2
  Top Layer w0.15: DD5.K1@68.86,102.17 68.879,102.189 68.983,102.189 68.994,102.2 69.66,102.2 69.86,102 R37.1@70.83,102 ; R37.1@70.83,101.93 C27.1@70.83,103.06
NetC40_1: C40.1 DD5.B11 | length 4.9
  Top Layer w0.08: v1(63.485,98.182) 63.491,98.176 63.816,98.176 DD5.B11@63.841,98.151
  Top Layer w0.15: DD5.B11@63.841,98.151 DD5.B11@63.86,98.17
  Bottom Layer w0.08: C40.1@59.81,96.187 61.491,96.187 v1(63.485,98.182)
NetC46_1: C46.1 DD5.A11 L4.1 | length 16.1
  Top Layer w0.305: L4.1@54.826,86.356 C46.1@55.76,86.356 ; C46.1@55.875,86.356 56.756,86.356 57.695,87.295 57.695,91.505 DD5.A11@63.86,97.67
NetC47_1: C47.1 L4.2 L5.1 | length 2.3
  Top Layer w0.305: L5.1@51.675,86.356 L4.2@53.926,86.356
NetC48_1: C48.1 L5.2 XW1.1 | length 2.9
  Top Layer w0.305: XW1.1@47.885,86.32 47.921,86.356 L5.2@50.775,86.356
NetDD1_11: DD1.11 HL1.2 | length 2.2
  Top Layer w0.223: HL1.2@77.71,109.675 78.41,108.975 DD1.11@79.61,108.975
NetDD1_12: DD1.12 R7.1 | length 1.9
  Top Layer w0.223: R7.1@77.71,108.475 DD1.12@79.61,108.475
NetDD1_13: DD1.13 R8.1 | length 2.3
  Top Layer w0.223: R8.1@77.71,107.375 77.71,107.425 78.371,108.087 78.822,108.087 78.904,108.004 79.581,108.004 DD1.13@79.61,107.975
NetDD1_16: DD1.16 R6.1 | length 2
  Top Layer w0.223: R6.1@77.71,106.275 78.33,106.275 78.341,106.264 78.822,106.264 79.004,106.447 79.581,106.447 DD1.16@79.61,106.475
NetDD1_17: DD1.17 R5.1 | length 2.2
  Top Layer w0.223: R5.1@77.71,105.175 78.31,105.175 79.081,105.947 79.581,105.947 DD1.17@79.61,105.975
NetDD1_25: DD1.25 HL2.2 | length 2
  Top Layer w0.223: HL2.2@83.36,102.675 DD1.25@83.36,104.725
NetDD1_28: DD1.28 HL3.2 | length 3.7
  Top Layer w0.223: DD1.28@85.31,105.475 85.42,105.475 87.31,103.585 HL3.2@87.31,102.675
NetDD1_33: DD1.33 GQ1.3 | length 5.7
  Top Layer w0.223: DD1.33@85.11,107.975 88.21,107.975 90.035,109.8 GQ1.3@90.085,109.8
NetDD1_35: DD1.35 R4.2 | length 1.9
  Top Layer w0.223: DD1.35@85.11,108.975 R4.2@87.01,108.975